# Altium PCB Gear_Trak-v1.0.PcbDoc (part 1 of 5)
Units mil, origin at the board's own origin, x right, y up, seen from the top; angles counter-clockwise.
Board outline 1383 x 2953 mil, 6 copper layers (TOP LAYER, GROUND1, SIGNAL, GROUND2, POWER, BOTTOM LAYER), stack 60.865 mil thick; 166 components, 125 nets, 751 pads, 771 vias.
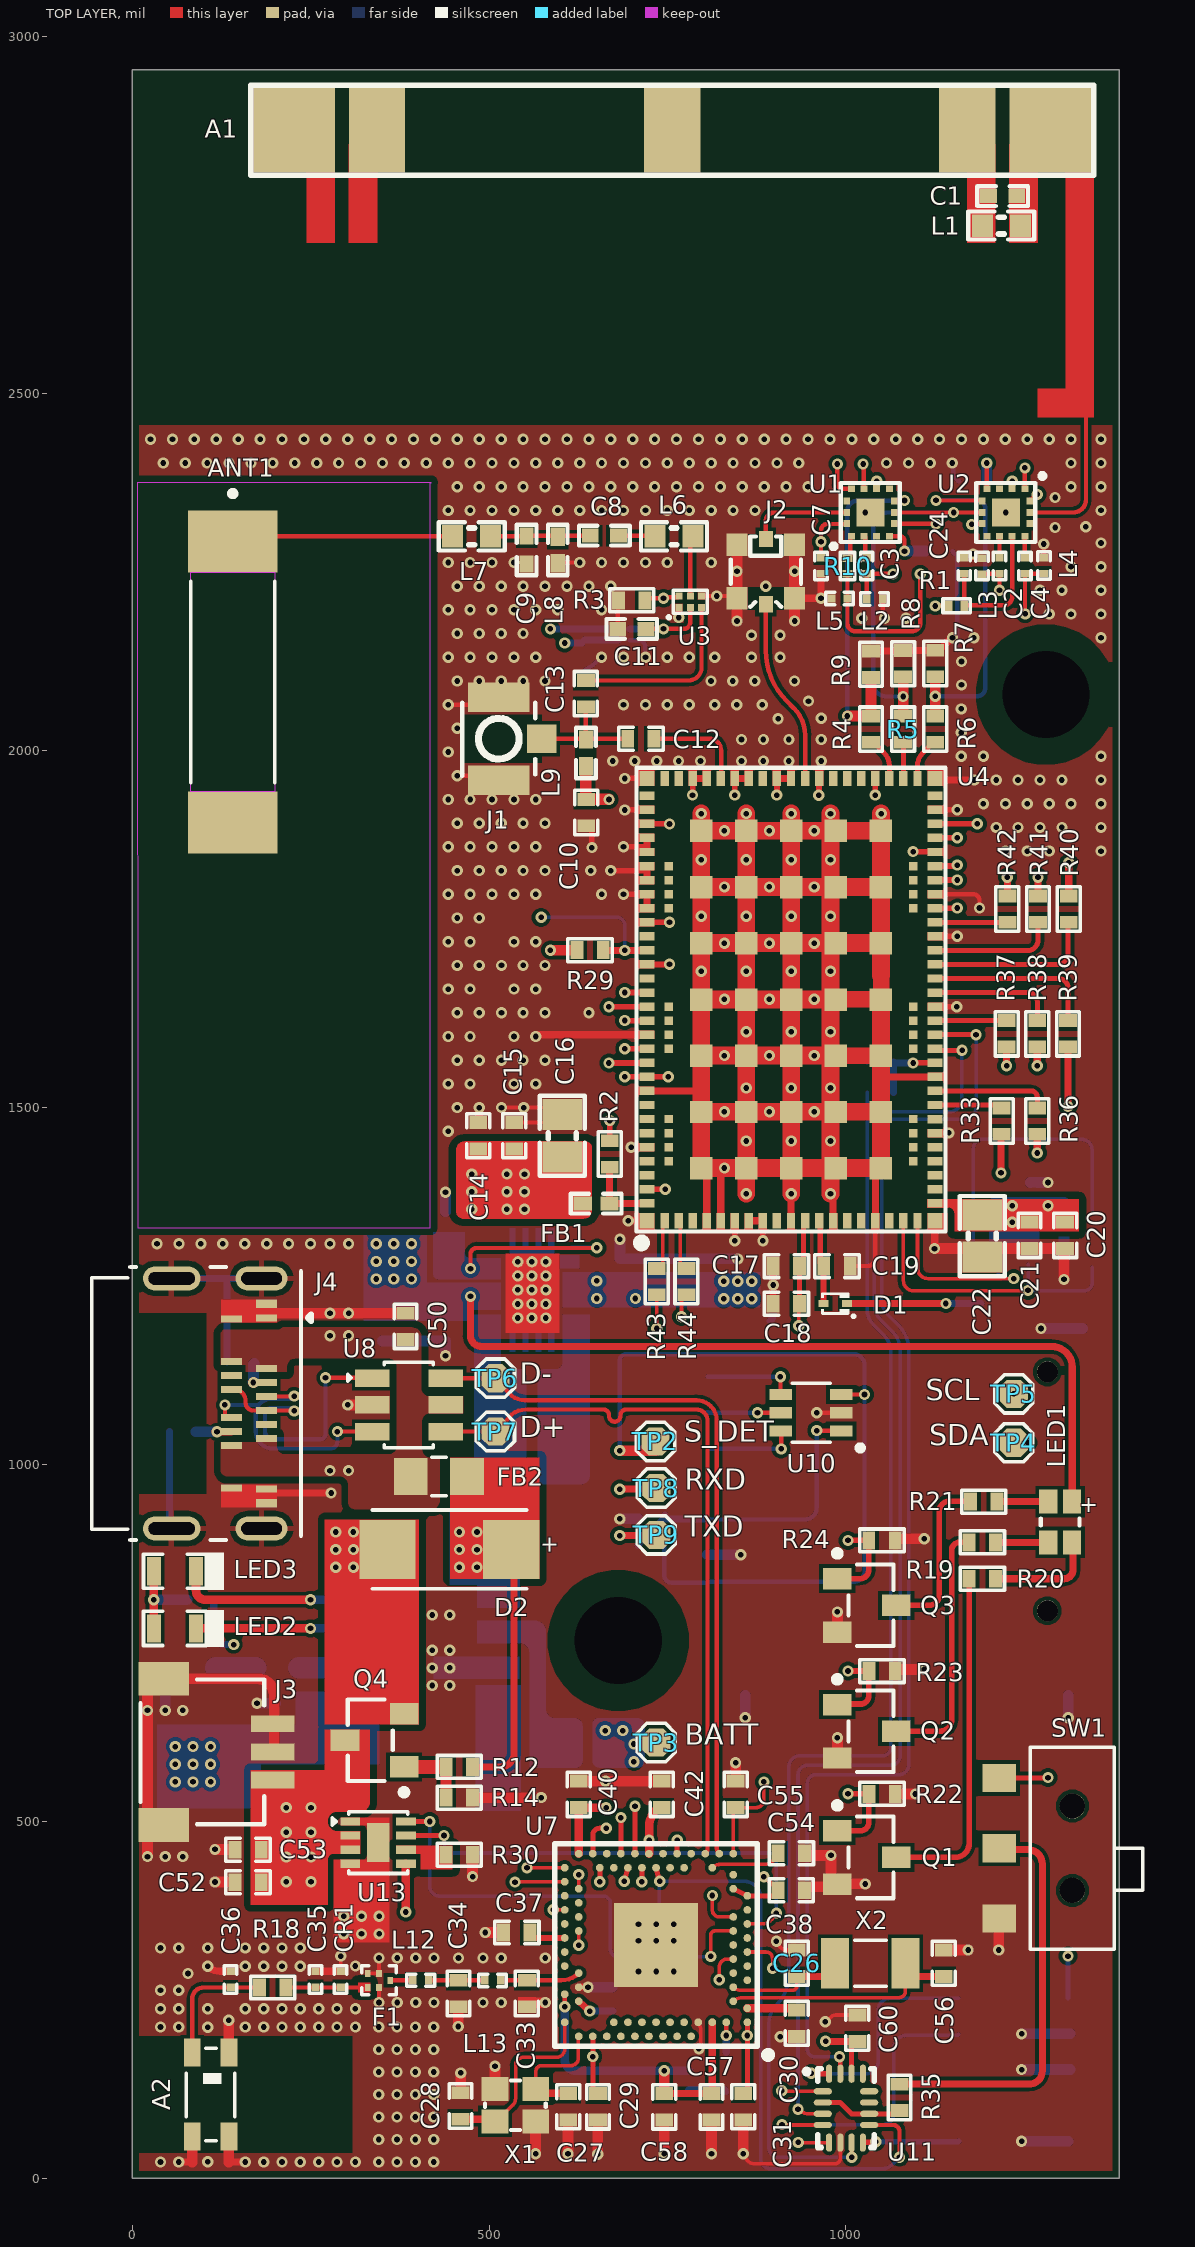
[diagram p0: TOP LAYER view]
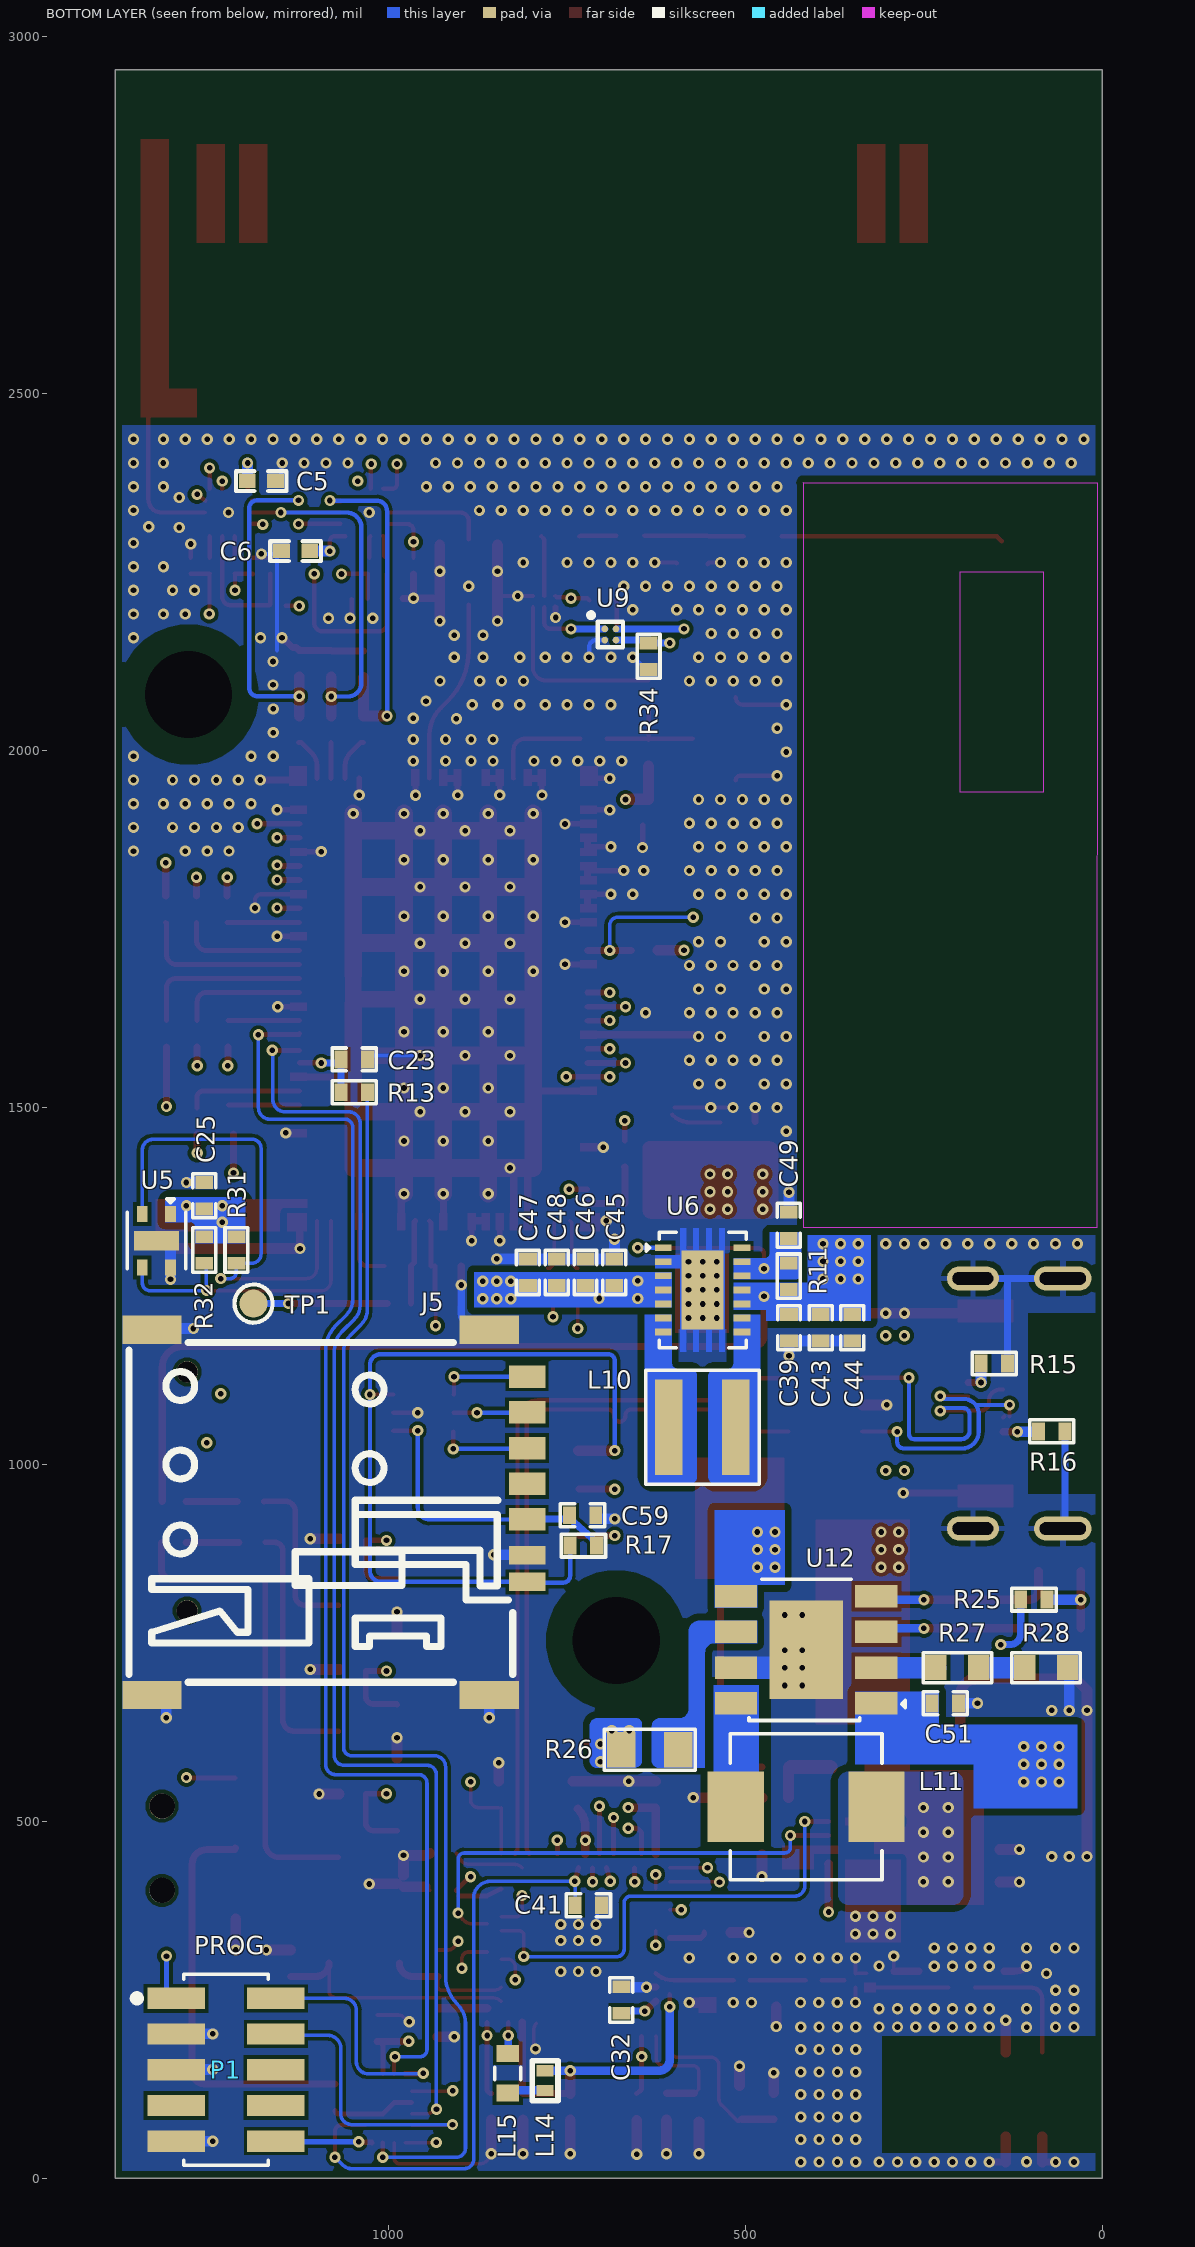
[diagram p1: BOTTOM LAYER view, seen from below]
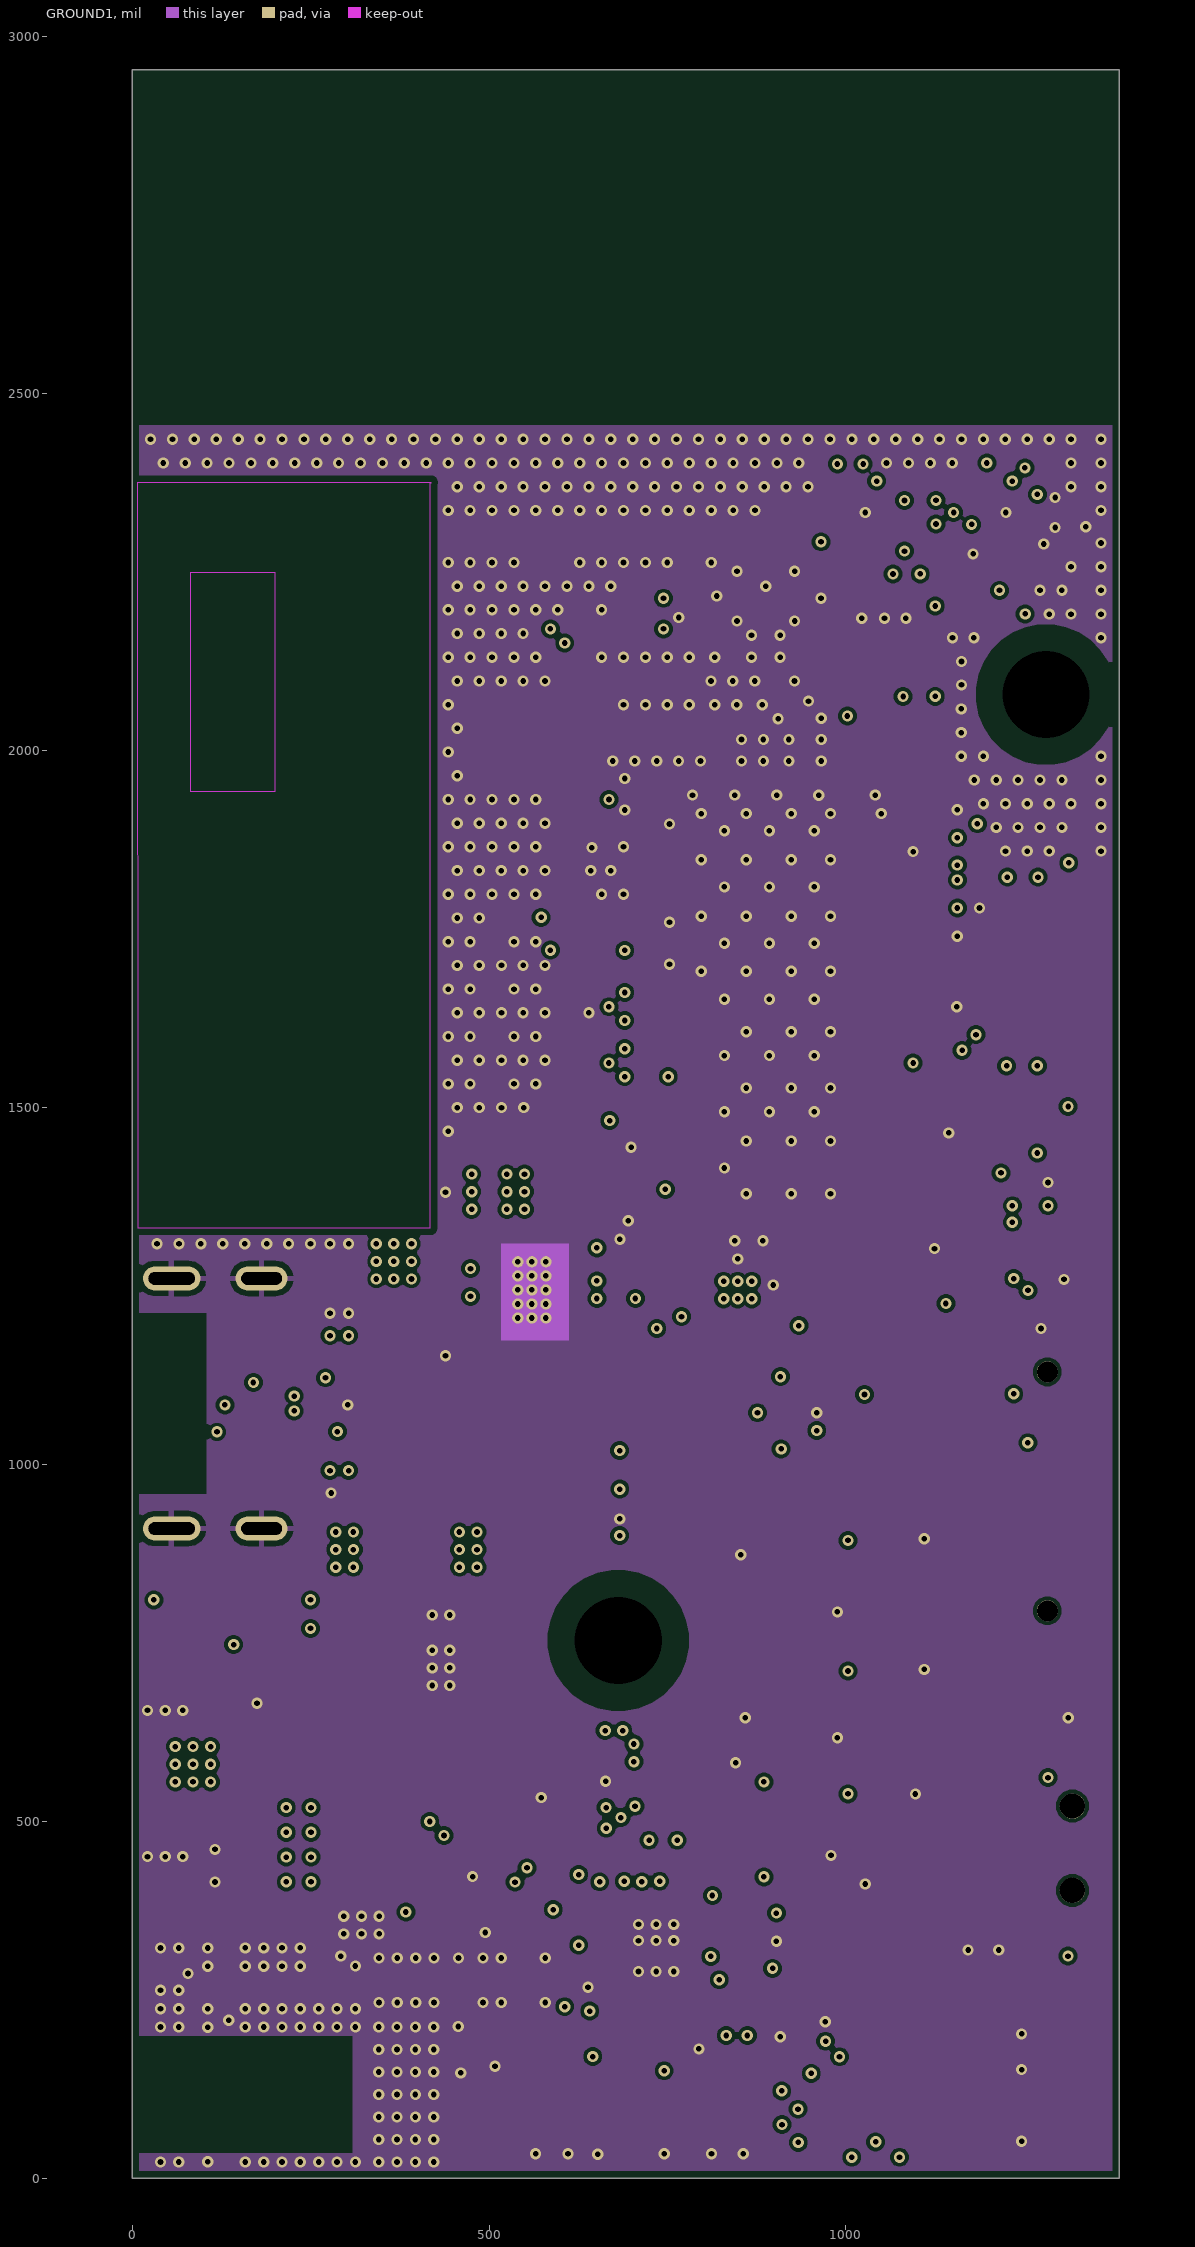
[diagram p2: GROUND1]
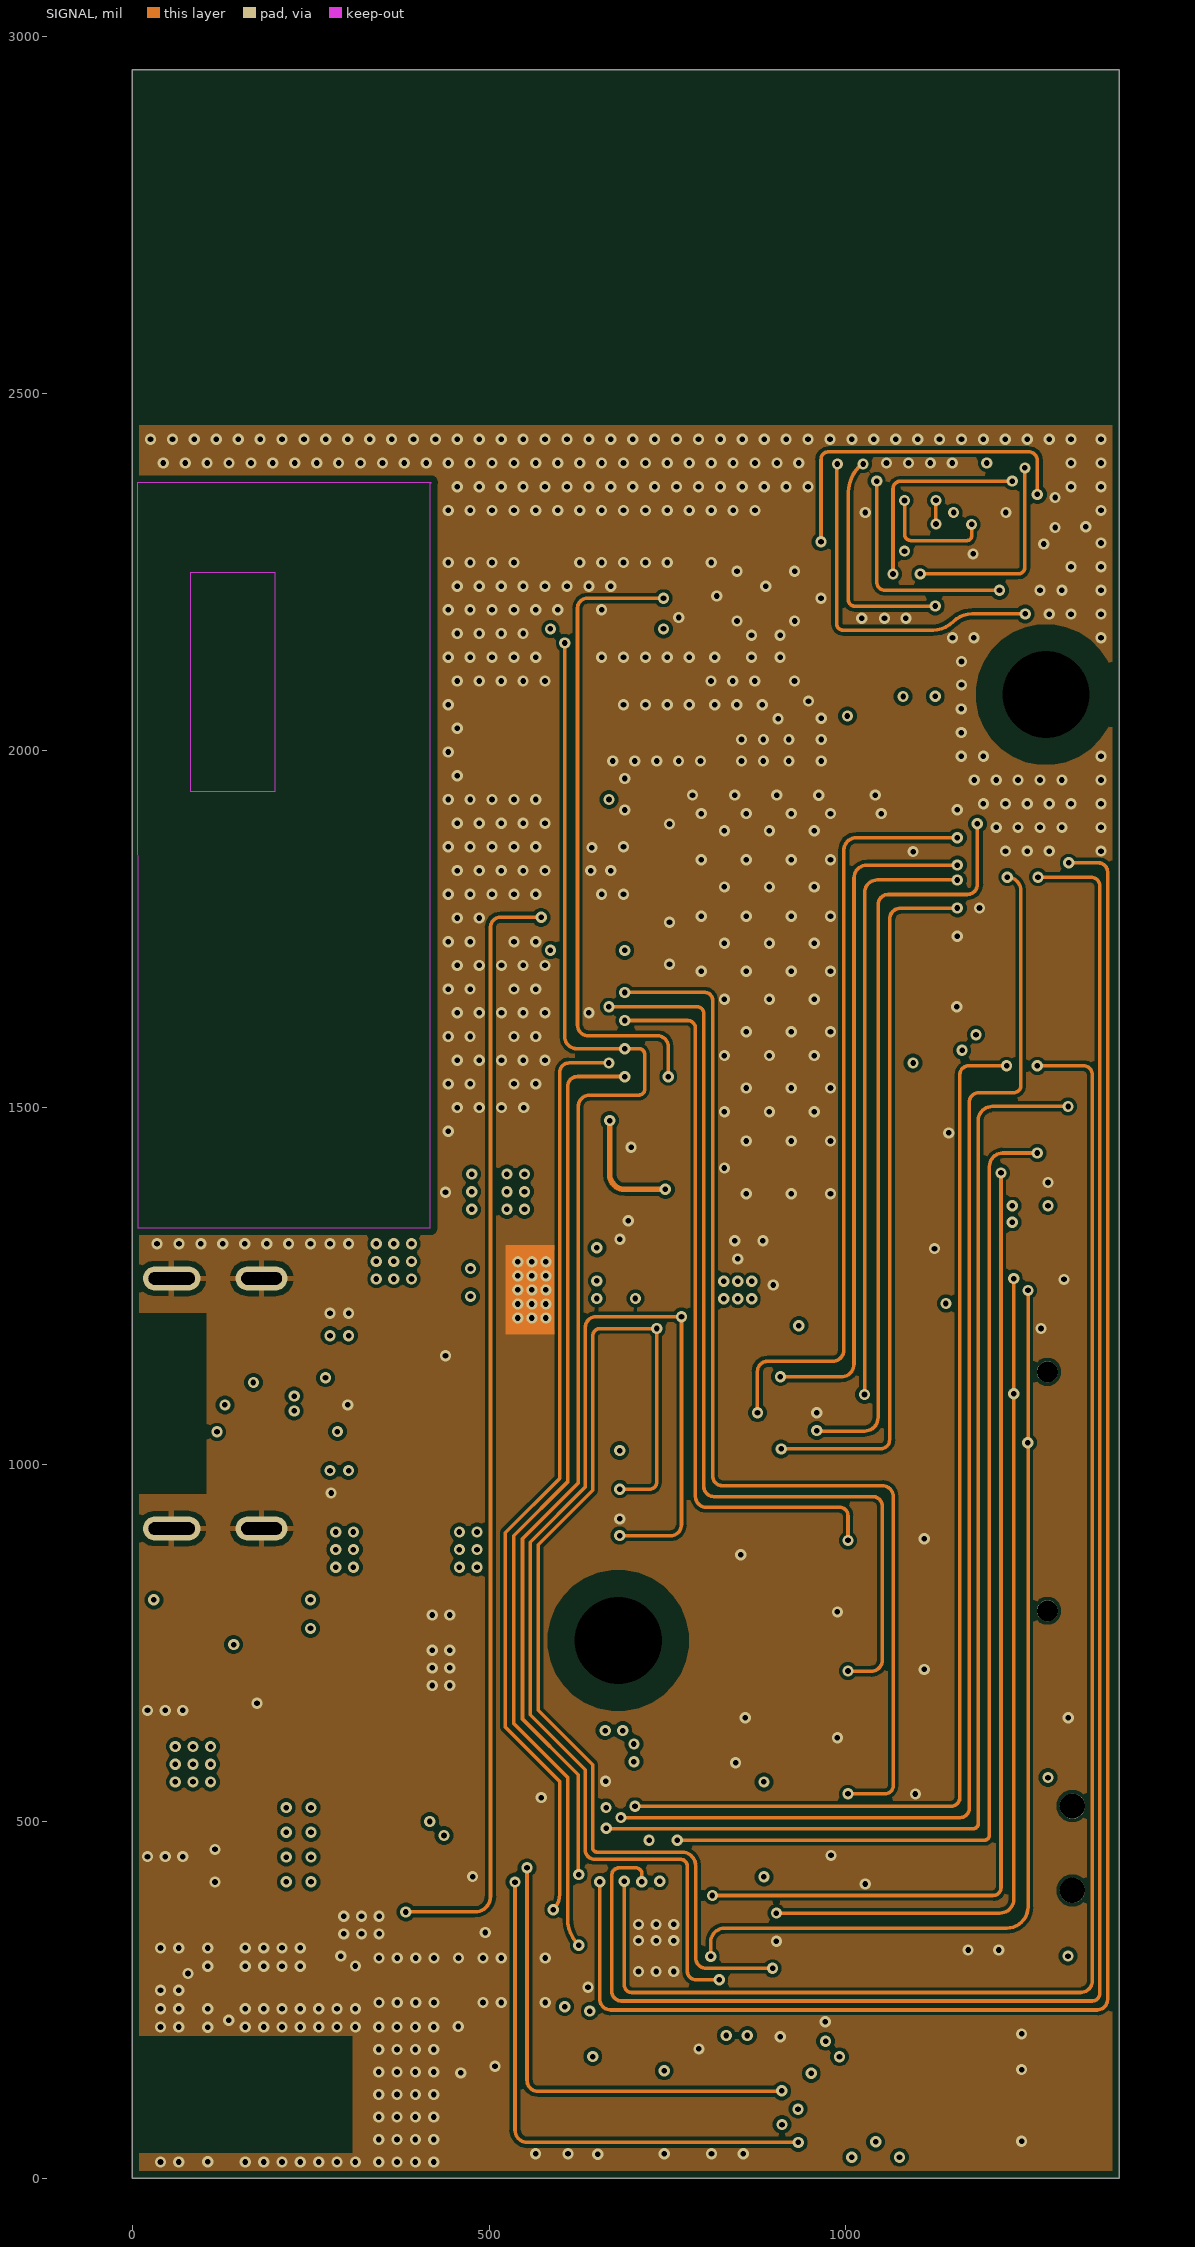
[diagram p3: SIGNAL]
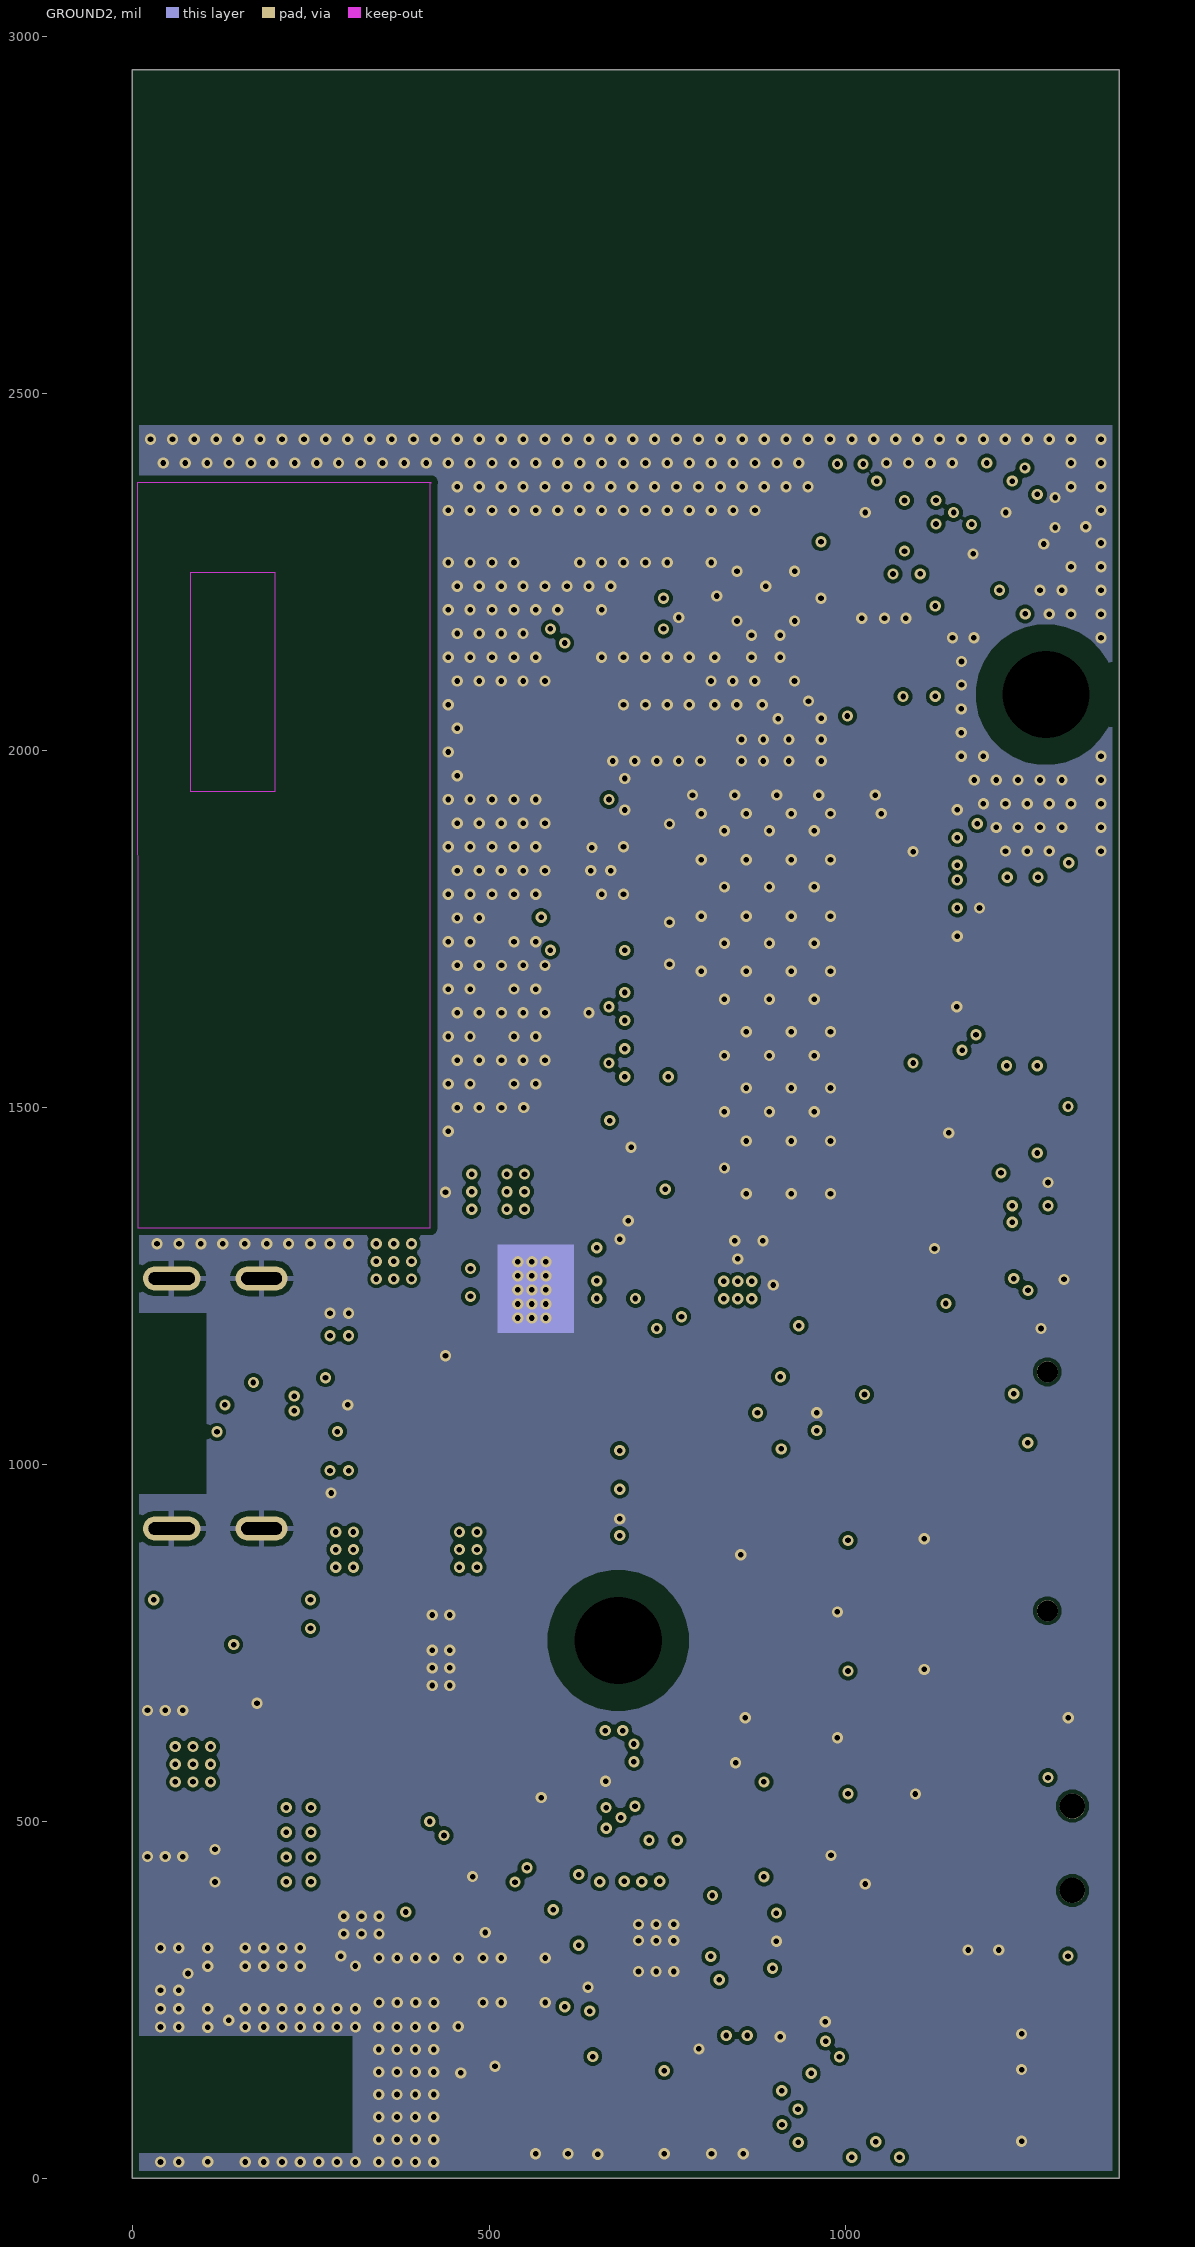
[diagram p4: GROUND2]
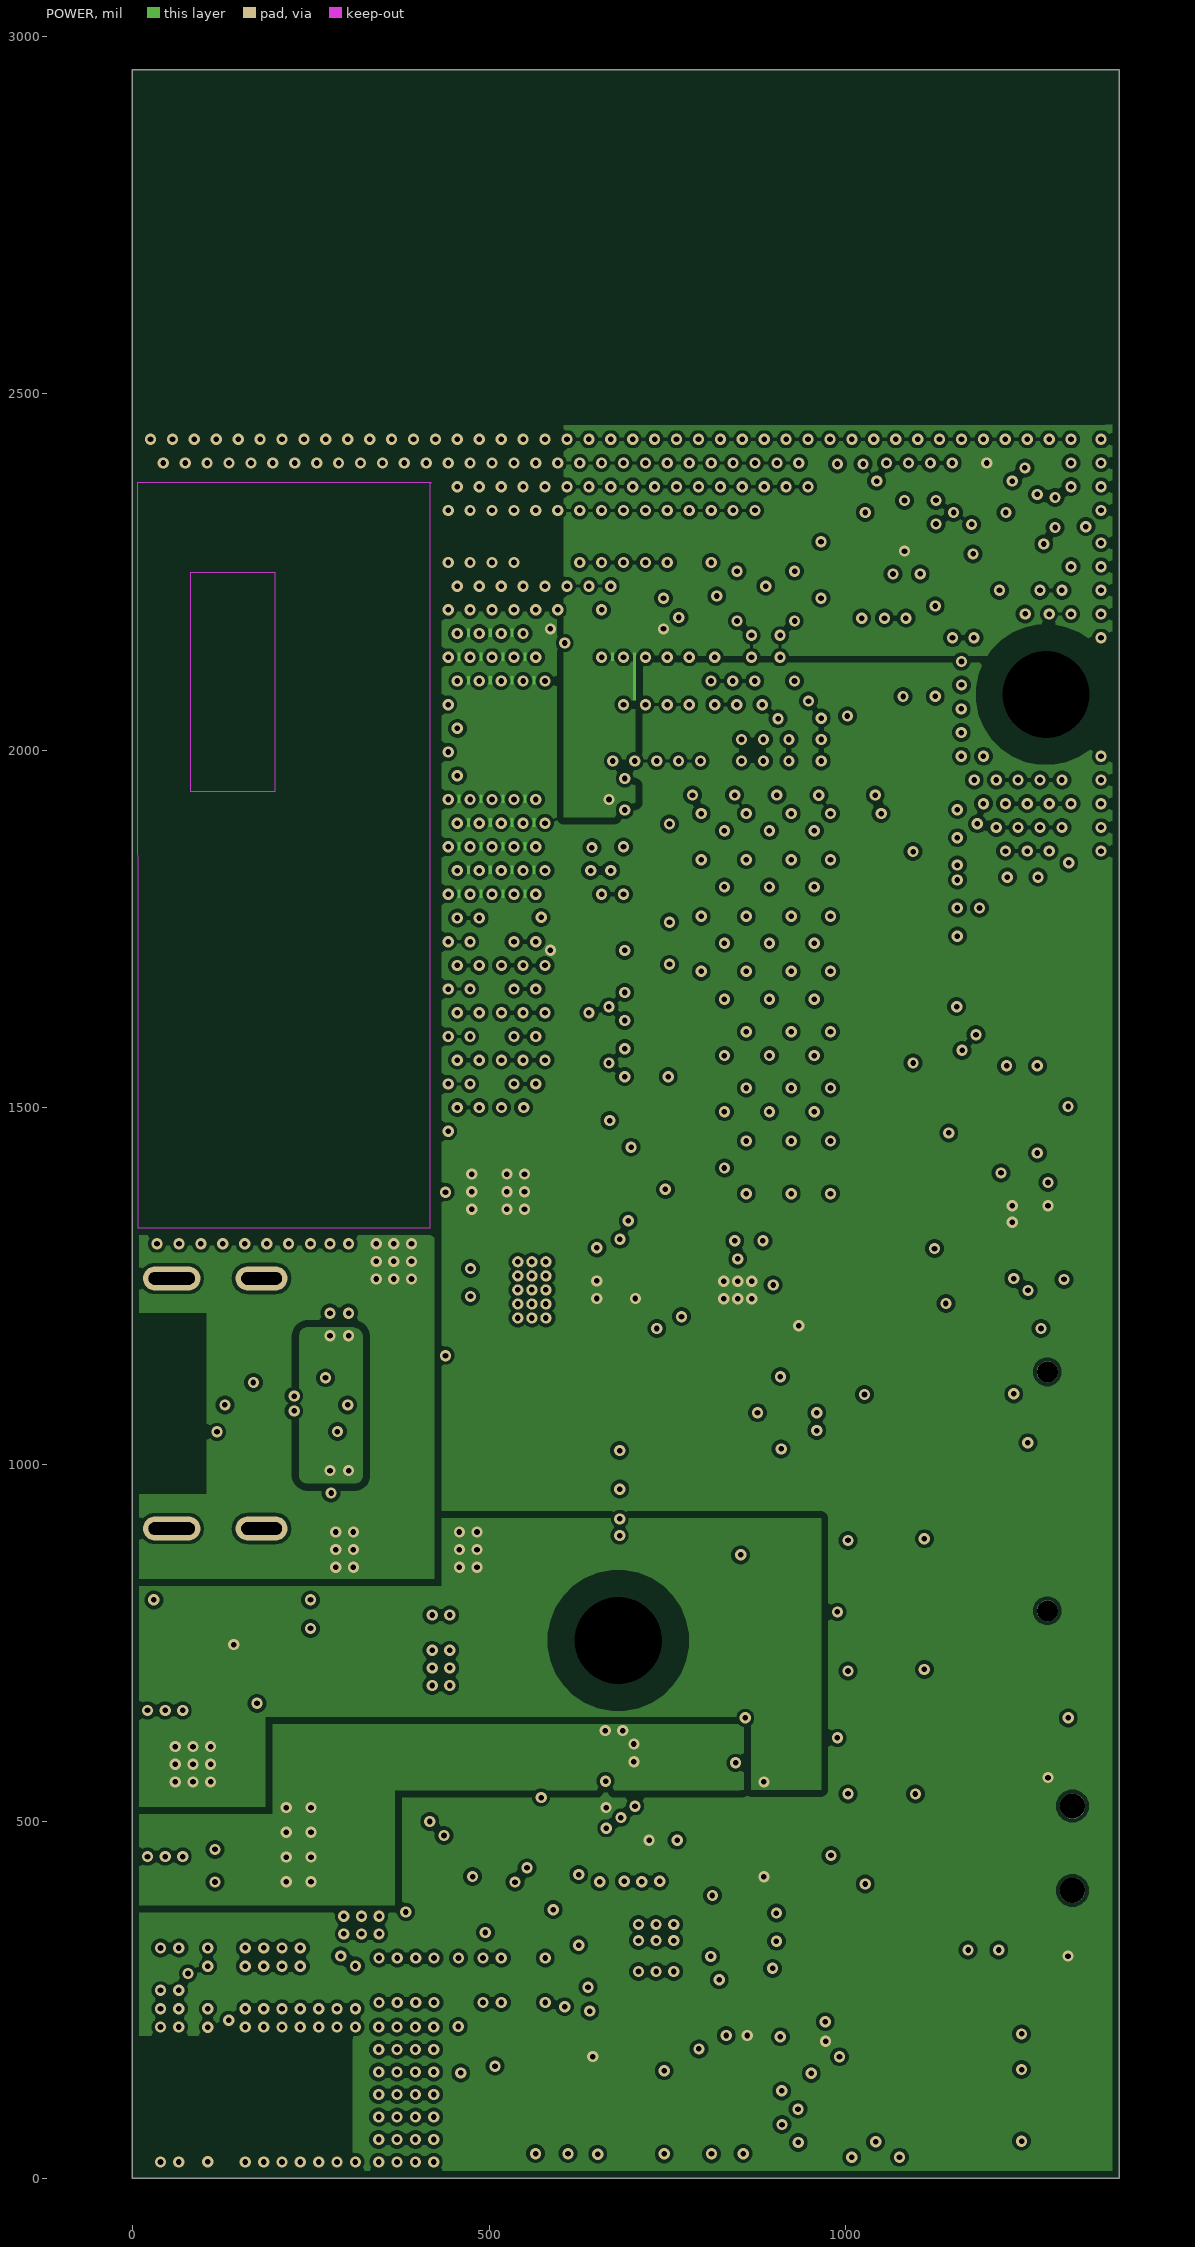
[diagram p5: POWER]
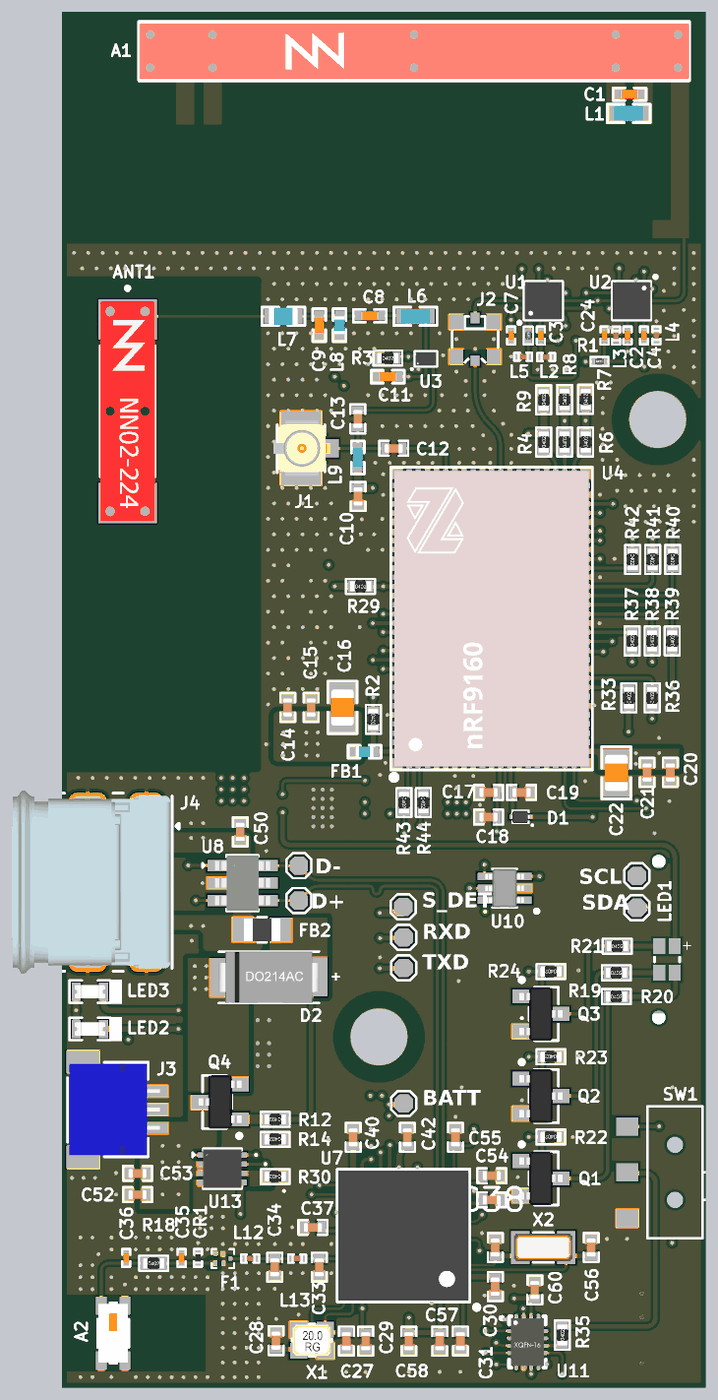
[diagram p8: 3D render of the assembled board from above, using the file's embedded part models]
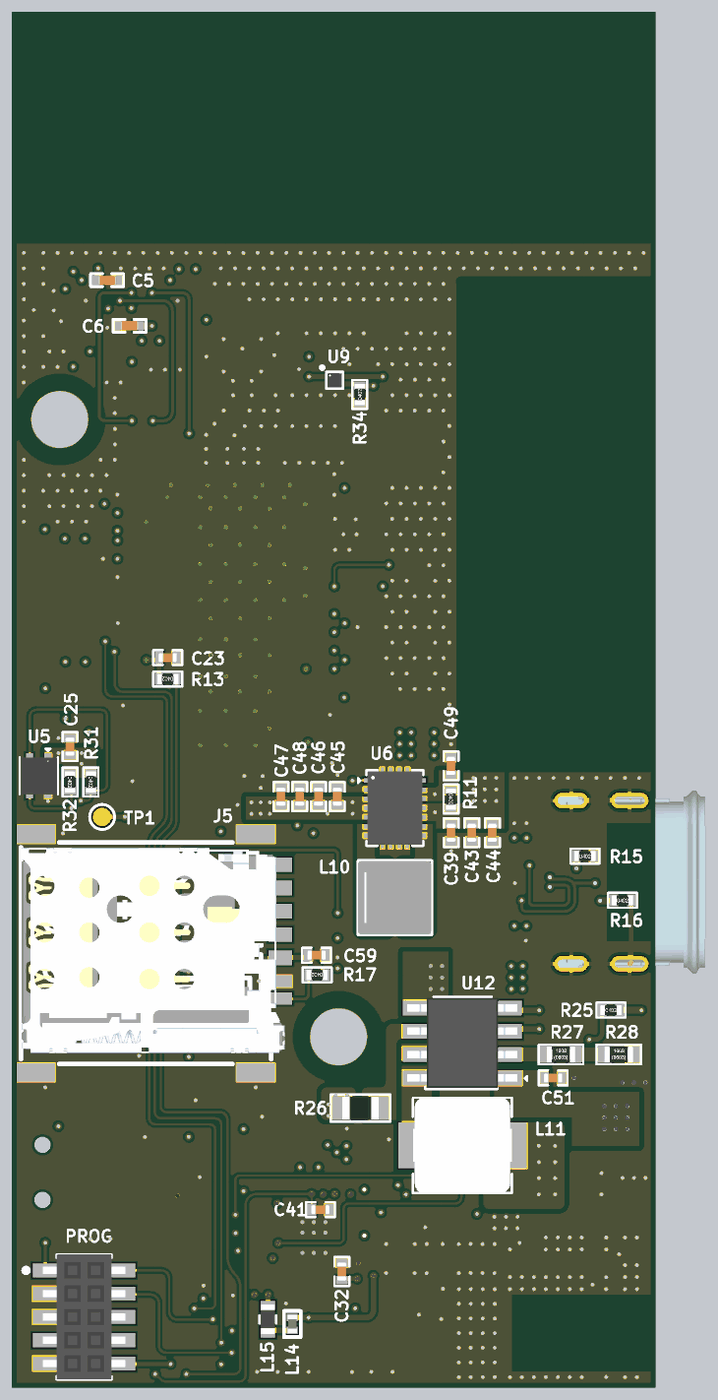
[diagram p9: 3D render of the assembled board from below, using the file's embedded part models]

## Layer stack, top to bottom
Top Solder: solder mask 1.187, Solder Resist, Dk 3.5
TOP LAYER: signal copper 1.378
Dielectric 1: prepreg 3.913, PP-015, Dk 4.1
GROUND1: signal copper 0.598
CORE 1: core 21.654, Core-025, Dk 4.6
SIGNAL: signal copper 0.598
Dielectric 2: prepreg 4.583, PP-016, Dk 4.16
GROUND2: signal copper 0.598
CORE 2: core 21.654, Core-025, Dk 4.6
POWER: signal copper 0.598
Dielectric 3: prepreg 3.913, PP-015, Dk 4.1
BOTTOM LAYER: signal copper 1.378
Bottom Solder: solder mask 1.187, Solder Resist, Dk 3.5

## Board outline
0,0 0,1121 0,2953 1383,2953 1383,0

## Design rules (kind name [scope] priority, off if disabled: settings)
BoardOutlineClearance [All] p1: gap=0 ignorepadtopadclearanceinfootprint=FALSE except(10: Fill-OutlineEdge Poly-OutlineEdge)
Clearance [All] p1: gap=5 ignorepadtopadclearanceinfootprint=FALSE except(10: Fill-Poly Poly-Poly Poly-Region)
ComponentClearance [All] p1 off: gap=10 collisioncheckmode=3 verticalgap=10 showdistances=FALSE
DiffPairsRouting [InDifferentialPairClass('USB')] p1: maxlimit=7 minlimit=5 mostfreqgap=5 toplayer_mingap=7 toplayer_prefgap=7 toplayer_minwidth=5.9 toplayer_maxwidth=5.9 toplayer_prefwidth=5.9 midlayer1_mingap=7 midlayer1_prefgap=7 midlayer1_minwidth=4.91 midlayer1_maxwidth=4.91 midlayer1_prefwidth=4.91 midlayer2_maxgap=5 midlayer2_minwidth=4.17 midlayer2_maxwidth=4.17 midlayer2_prefwidth=4.17 midlayer3_maxgap=5 midlayer3_minwidth=4.57 midlayer3_maxwidth=4.57 midlayer3_prefwidth=4.57 midlayer4_maxgap=5 midlayer4_minwidth=4.64 midlayer4_maxwidth=4.64 midlayer4_prefwidth=4.64 bottomlayer_mingap=7 bottomlayer_prefgap=7 bottomlayer_minwidth=5.9 bottomlayer_maxwidth=5.9 bottomlayer_prefwidth=5.9 impedanceprofiledriven=TRUE impedanceprofileid={BFF03AB4-9B6E-46EF-8445-FC28C5802467} impedanceprofilevalue=90.000000 maxuncoupledlength=500
FabricationTestPointUsage TestPointUsage [All] p1: valid=0 allowmultiple=FALSE
FabricationTestpoint Testpoint [All] p1: side=3 testpointundercomponent=TRUE minsize=40 maxsize=100 preferedsize=60 minholesize=0 maxholesize=40 preferedholesize=32 testpointgrid=1 allowsidetop=TRUE allowsidebottom=TRUE usegrid=TRUE gridtolerance=0.01
Height [All] p1 off: minheight=0 maxheight=1000 prefheight=500
HoleSize [All] p1: absolutevalues=TRUE maxlimit=196.85 minlimit=3.94 maxpercent=80.000 minpercent=20.000
MinimumAnnularRing [All] p1 off: minimumring=6
NetAntennae NetAntennae_ANT [InNet('ANT')] p1: netantennaetolerance=1574.8
NetAntennae [All] p2: netantennaetolerance=0
PlaneClearance [All] p1: clearance=15.75
PolygonConnect [All] p1: thpad.connectstyle=Relief thpad.reliefconductorwidth=7.87 thpad.reliefentries=4 thpad.polygonreliefangle="90 Angle" thpad.airgapwidth=7.87 smdpad.connectstyle=Direct smdpad.reliefconductorwidth=11.81 smdpad.reliefentries=4 smdpad.polygonreliefangle="90 Angle" smdpad.airgapwidth=7.87 via.connectstyle=Direct via.reliefconductorwidth=10 via.reliefentries=4 via.polygonreliefangle="90 Angle" via.airgapwidth=10
RoutingVias [All] p1: holewidth=7.87 width=15.75 viastyle="Through Hole" minholewidth=7.87 minwidth=15.75 maxholewidth=11.81 maxwidth=23.62
ShortCircuit ShortCircuit_AGND/GND [InNet('AGND') vs InNet('GND')] p1: allowed=TRUE
ShortCircuit [All] p2: allowed=FALSE
SilkToSolderMaskClearance SilkscreenOverComponentPads [IsPad] p1: minsilkscreentomaskgap=10 clearancetoexposedcopper=TRUE
SolderMaskExpansion SolderMaskExpansion_1 [IsVia] p1: expansion=4 istentingtop=FALSE
SolderMaskExpansion [All] p2: expansion=3 istentingtop=FALSE
SupplyNets "Schematic Supply Nets_7" [InNet('VDD_RF_FE')] p1: voltage=0.000
SupplyNets "Schematic Supply Nets_6" [InNet('VBAT')] p2: voltage=0.000
SupplyNets "Schematic Supply Nets_5" [InNet('VBUS-TYPEC')] p3: voltage=0.000
SupplyNets "Schematic Supply Nets_4" [InNet('GND')] p4: voltage=0.000
SupplyNets "Schematic Supply Nets_3" [InNet('VBUS')] p5: voltage=0.000
SupplyNets "Schematic Supply Nets_2" [InNet('SIM_1V8')] p6: voltage=0.000
SupplyNets "Schematic Supply Nets_1" [InNet('VSYS')] p7: voltage=0.000
SupplyNets "Schematic Supply Nets" [InNet('+3V3')] p8: voltage=0.000
UnpouredPolygon [All] p1 off:
Width [All] p1: maxlimit=400 minlimit=4.92 preferedwidth=6 toplayer_minwidth=5 midlayer1_minwidth=5 midlayer2_minwidth=5 midlayer3_maxwidth=100 midlayer3_prefwidth=5.91 midlayer4_maxwidth=100 midlayer4_prefwidth=5.91 bottomlayer_minwidth=5 minimp=50.000000 maximp=50.000000 favimp=50.000000
19 further rules are at their usual default settings.

## Classes and differential pairs
differential pair class USB: TYPEC TYPEC_D
component class "1.Power Source": C39 C43 C44 C45 C46 C47 C48 C49 C50 D2 FB2 J3 J4 L10 Q4 R11 R12 R14 R15 R16 R34 TP6 TP7 U6 U8 U9
component class "2.Battery Management": C51 C52 C53 L11 LED2 LED3 R25 R26 R27 R28 R29 R30 R31 R32 TP3 U12 U13
component class 6.Connectors: C59 C60 J5 P1 R17 R35 SW1 TP2 U10 U11
component class 4.Microcontroller-NRF9160: A1 ANT1 C1 C2 C3 C4 C5 C6 C7 C8 C9 C10 C11 C12 C13 C14 C15 C16 C17 C18 C19 C20 C21 C22 C23 C24 D1 FB1 J1 J2 L1 L2 L3 L4 L5 L6 L7 L8 L9 R1 R2 R3 R4 R5 R6 R7 R8 R9 R10 R13 R33 R36 R37 R38 R39 R40 R41 R42 R43 R44 TP1 TP8 TP9 U1 U2 U3 U4
component class 5.RGB_TEMP-HUMIDITY: C25 LED1 Q1 Q2 Q3 R19 R20 R21 R22 R23 R24 TP4 TP5 U5
differential pair TYPEC: +TYPEC_P -TYPEC_N
differential pair TYPEC_D: +TYPEC_D_P -TYPEC_D_N

## Components (designator, comment, footprint, x,y, rotation, side; value= is the part's Value field where it differs from the comment)
A1 "NN03-310" FR01-S4-210_DF 756.57,2868.62 r0 top value=FR01-S4-210
A2 "2450AT18D0100E" 2450AT18D0100E 109.94,117.11 r270 top
ANT1 "NN02-224" ANT-NN02-224 141,2292.54 r270 top
C1 "0.5pF" CAPC1005X04L 1219.43,2776.15 r180 top
C2 "2.5pF" CAPC0603X03L_C 1215.05,2258.26 r270 top
C3 "5.5pF" CAPC0603X03L_C 1029,2258.26 r90 top
C4 "9.2pF" CAPC0603X03L_C 1250.48,2258.32 r270 top
C5 "2.2nF" CAPC1005X04L 1178.17,2377 r180 bottom
C6 "2.2nF" CAPC1005X04L 1130,2279 r0 bottom
C7 "1.5pF" CAPC0603X03L_C 965,2258.26 r270 top
C8 "1nF" CAPC1005X04L 661.49,2300.54 r180 top
C9 "3.7pF" CAPC1005X04L 552.7,2280.54 r270 top
C10 "39pF" Cap-0402 636.1,1912.74 r90 top
C11 "33nF" CAPC1005X04L 700,2170 r0 top
C12 "39pF" Cap-0402 712.76,2016.17 r0 top
C13 "39pF" Cap-0402 635.64,2079.34 r270 top
C14 "15pF" Cap-0402 485,1460 r270 top
C15 "100nF" cap-0402 535.38,1460 r90 top
C16 "47uF" CAPC2012X11L 602.57,1460 r90 top
C17 "100nF" cap-0402 916.49,1277.45 r180 top
C18 "4.7uF" Cap-0402 916.48,1224.63 r180 top
C19 "4.7uF" Cap-0402 987.37,1277.45 r0 top
C20 "15pF" Cap-0402 1307,1320.5 r90 top
C21 "100nF" cap-0402 1257,1320.5 r270 top
C22 "47uF" CAPC2012X11L 1191,1319.47 r270 top
C23 "100nF" cap-0402 1048,1567 r180 bottom
C24 "3.1pF" CAPC0603X03L_C 1165.69,2258.26 r270 top
C25 "100nF" cap-0402 1258,1376 r90 bottom
C26 "12pF" Cap-0402 931,301 r270 top
C27 "12pF" Cap-0402 611,100 r270 top
C28 "12pF" Cap-0402 460,101 r90 top
C29 "100nF" cap-0402 652.64,99.78 r270 top
C30 "100nF" cap-0402 931,217 r270 top
C31 "1uF" Cap-0402 856,100 r90 top
C32 "100nF" cap-0402 673.83,249.44 r90 bottom
C33 "1pF" Cap-0402 553,258.58 r90 top
C34 "1.2pF" Cap-0402 457.23,258.58 r90 top
C35 "DNP" CAPC0603X03L_C 256.88,278.44 r270 top
C36 "DNP" CAPC0603X03L_C 138,278.44 r270 top
C37 "820pF" Cap-0402 539,344 r180 top
C38 "4.7uF" Cap-0402 923.43,403.1 r0 top
C39 "22uF" Cap-0402 439,1191.09 r90 bottom
C40 "100nF" cap-0402 625.63,537.5 r90 top
C41 "100nF" cap-0402 720,382.21 r180 bottom
C42 "100nF" cap-0402 742,537.5 r90 top
C43 "22uF" Cap-0402 394.68,1191.09 r90 bottom
C44 "22uF" Cap-0402 350.36,1191.09 r90 bottom
C45 "22uF" Cap-0402 683.72,1268.7 r270 bottom
C46 "22uF" Cap-0402 724.04,1268.7 r270 bottom
C47 "22uF" Cap-0402 804.68,1268.69 r270 bottom
C48 "22uF" Cap-0402 764.36,1268.7 r270 bottom
C49 "100nF" cap-0402 439.36,1334.7 r270 bottom
C50 "100nF" cap-0402 383.05,1193 r90 top
C51 "22uF" Cap-0402 220,665 r0 bottom
C52 "22uF" Cap-0402 162.5,414.4 r0 top
C53 "1uF" Cap-0402 162.5,460 r0 top
C54 "4.7uF" Cap-0402 923.5,455 r0 top
C55 "4.7uF" Cap-0402 845.4,537.5 r90 top
C56 "12pF" Cap-0402 1137,301 r270 top
C57 "1uF" Cap-0402 811.56,99.78 r90 top
C58 "47nF" Cap-0402 745.37,99.78 r90 top
C59 "100nF" cap-0402 728.18,928.38 r0 bottom
C60 "100nF" cap-0402 1015.91,210 r90 top
CR1 "EZA-EG1N50AC" RESC0603X03L_C 292.14,278.44 r270 top
D1 "NSR0620P2T5G" SODFL100X40-2N 985,1225 r180 top
D2 "SS54" DO-214AC(SMA) 437.54,876.81 r0 top
F1 "SAFFB2G45MA0F0A" SAFFB2G45MA0F0A 345.84,277.06 r180 top
FB1 "120R/0.7A" INDC1005X04L 650,1365 r0 top
FB2 "BLM21PG221SN1D" Ind-0805 429.88,982.79 r0 top
J1 "U.FL-R-SMT-1(10)" "COAXIAL RF U.FL-R-SMT-1" 513.64,2016.17 r90 top
J2 "MM8130-2600RA2" COAXIAL-SWF 887.66,2250.14 r180 top
J3 "BATT" CONN_SMD_3P_1mm_SM03B-SRSS-TB 197,597 r270 top
J4 "203615-0003" 2036150003 122,1085 r270 top
J5 "SMN-303" XUNPU_SMN-303 1072.63,907.99 r270 bottom locked
L1 "15nH" INDC1608X06L_WW 1217.57,2735 r180 top
L2 "5.1nH" INDC0603X03L_C 1040.22,2212 r180 top
L3 "DNP" INDC0603X03L_C 1190.37,2258.03 r270 top
L4 "6.2nH" INDC0603X03L_C 1277.2,2258.58 r270 top
L5 "4.7nH" INDC0603X03L_C 990.93,2212.6 r0 top
L6 "8.2nH" INDC1608X06L_WW 759.2,2299.54 r180 top
L7 "11nH" INDC1608X06L 475.65,2299.54 r180 top
L8 "2.4nH" INDC1005X04L_2 596.27,2280.55 r90 top
L9 "68nH" INDC1005X04L_WW 635.64,1996.24 r90 top
L10 "1uH" XFL4020-102MEC 560.5,1051.7 r0 bottom
L11 "2.2uH" YSPI0520-2R2M_ 415,520 r180 bottom
L12 "2.2nH" INDC0603X03L_C 404.35,277.09 r180 top value=3.9nH
L13 "4.7nH" INDC0603X03L_C 505.12,277 r180 top
L14 "15nH" IND-0402 780.5,136.57 r90 bottom
L15 "10uH" "IND-0603 (1608 Metric)" 833,147 r270 bottom value=1.05R
LED1 "RGB" LED_RGB_0606 1300,919 r180 top
LED2 "Emerald" LED-0603 60,770 r0 top
LED3 "RED" LED-0603 60,850 r0 top
P1 "20021321-00010C4LF" 20021321-00010C4LF 1227.59,151.78 r180 bottom
Q1 "AO3400" SOT-23a 987.81,486.63 r270 top
Q2 "AO3400" SOT-23a 987.81,663.23 r270 top
Q3 "AO3400" SOT-23a 987.81,839.63 r270 top
Q4 "SI2343CDS" SOT-23a 380.96,575.9 r90 top
R1 "0R" Res-0201 1154.87,2202.5 r0 top
R2 "10K" Res-0402 669,1434.5 r270 top
R3 "100K" Res-0402 700,2210 r0 top
R4 "1K" Res-0402 1035.01,2029.63 r90 top
R5 "1K" Res-0402 1080.01,2029.63 r90 top
R6 "1K" Res-0402 1125.01,2029.63 r90 top
R7 "1M" Res-0402 1125.01,2121.5 r90 top value=1MR
R8 "1M" Res-0402 1080.01,2121.07 r90 top value=1MR
R9 "1M" Res-0402 1035.01,2120.37 r90 top value=1MR
R10 "0R" Res-0201 1002.15,2258.01 r270 top
R11 "DNP" Res-0402 439.36,1263.4 r270 bottom
R12 "47K" Res-0402 458.23,575.9 r180 top
R13 "1K" Res-0402 1048,1521 r0 bottom
R14 "100K" Res-0402 458.23,532.9 r180 top
R15 "5.1K" Res-0402 151.5,1141 r180 bottom
R16 "5.1K" Res-0402 71,1046 r180 bottom
R17 "100K" Res-0402 727,886 r0 bottom
R18 "0R" Res-0402 197,267 r0 top
R19 "200R" Res-0402 1191,890.46 r0 top
R20 "330R" Res-0402 1191,839.53 r0 top
R21 "200R" Res-0402 1193,947.54 r0 top
R22 "100K" Res-0402 1050.49,538.23 r180 top
R23 "100K" Res-0402 1050.49,710.23 r180 top
R24 "100K" Res-0402 1050.48,893.23 r180 top
R25 "1K" Res-0402 95.9,810.37 r180 bottom
R26 "1K" RES-0805 634,600 r0 bottom value=1kR
R27 "953R" Res-0603 203.22,715.15 r0 bottom
R28 "15R" Res-0603 78.9,715 r0 bottom
R29 "10K" Res-0402 641.5,1720 r0 top
R30 "10K" Res-0402 458.23,453 r180 top
R31 "4.7K" Res-0402 1213,1300 r270 bottom
R32 "4.7K" Res-0402 1258,1300 r270 bottom
R33 "DNP" Res-0402 1218,1480.64 r90 top
R34 "100K" Res-0402 635.64,2131.75 r90 bottom
R35 "100K" Res-0402 1075,113 r90 top
R36 "DNP" Res-0402 1268,1480.64 r90 top
R37 "DNP" Res-0402 1225,1602.75 r90 top
R38 "DNP" Res-0402 1268,1602.75 r90 top
R39 "DNP" Res-0402 1311,1602.75 r90 top
R40 "DNP" Res-0402 1312,1777.55 r270 top
R41 "DNP" Res-0402 1269,1777.55 r270 top
R42 "DNP" Res-0402 1226,1777.55 r270 top
R43 "0R" Res-0402 735,1255.79 r270 top
R44 "0R" Res-0402 776.52,1255.79 r270 top
SW1 "K3-1280S-F1" K3-1280S-F1 1265.82,462.06 r90 top
TP1 "Ø1.0mm,SMD" TP_SMD_Ø1.0mm 1189,1225 r180 bottom
TP2 "TEST POINT 0.5mm Dia" "Test-point - 0.5mm" 733.18,1031.93 r90 top
TP3 "TEST POINT 0.5mm Dia" "Test-point - 0.5mm" 734.18,610 r90 top
TP4 "TEST POINT 0.5mm Dia" "Test-point - 0.5mm" 1235,1030.01 r90 top
TP5 "TEST POINT 0.5mm Dia" "Test-point - 0.5mm" 1235,1098.52 r90 top
TP6 "TEST POINT 0.5mm Dia" "Test-point - 0.5mm" 509,1120.4 r90 top
TP7 "TEST POINT 0.5mm Dia" "Test-point - 0.5mm" 509,1045.6 r90 top
TP8 "TEST POINT 0.5mm Dia" "Test-point - 0.5mm" 734.18,966.43 r90 top
TP9 "TEST POINT 0.5mm Dia" "Test-point - 0.5mm" 734.18,901 r90 top
U1 "SKY13418-485LF" UFQFN40P200X200X65_HS-15N 1034.09,2333.07 r90 top
U2 "SKY13418-485LF" UFQFN40P200X200X65_HS-15N 1223.91,2333.08 r270 top
U3 "BGA524N6" XFDFN40P100X55-6N 781.88,2208.17 r90 top
U4 "nRF9160-SICAB1A" LGA50P1600X1050X104-161N 923,1650.78 r90 top locked
U5 "SHTC3-TR-2.5KS" "4-WDFN Exposed Pad" 1325,1313 r270 bottom
U6 "TPS63021DSJR" "14-VSON (4x3)" 560,1244.09 r180 bottom
U7 "nRF52840" AQFN50P700X700X85_HS-74N 733.9,326.5 r180 top
U8 "USBLC6-2SC6" SOT-23-6 388,1083 r0 top
U9 "TCK106AG" BGA4C40P2X2_76X76X62 689.17,2162.13 r180 bottom
U10 "SMF05C.TCT" SOT65P210X110-6N 960,1092 r180 top
U11 "FSA2466UMX" XQFN40P180X260X50-16N 1000,98 r0 top
U12 "SLM6600" 8-SO-EP_ 415,740 r0 bottom
U13 "MAX17048G+T10" "8-TDFN-EP (2x2)" 344.66,470 r0 top
X1 "32MHz" BT-XTAL_2016 537,102 r0 top
X2 "32.768KHz" SMD3215-2P 1034,301 r180 top

## Footprints (in the part's own frame and the unit in brackets; to place one, negate y for a bottom-side part, rotate by r counter-clockwise, add the part's x,y. Pads: shape width x height; smd on the part's side, far side on the other; paste and mask are expansions set on the pad)
"4-WDFN Exposed Pad" [mm]
  rect 0.57x0.38 smd paste+0 mask+0.051: 1(-0.95,0.5) 2(-0.95,-0.5) 3(0.95,-0.5) 4(0.95,0.5)
  rect 0.7x1.6 smd paste+0 mask+0.051: 5(0,0)
  silkscreen extent -1.48,-1.04 0.99,1.04, body extent -1,-1 1,1, height 0.76
8-SO-EP_ [mm]
  rect 1.505x0.802 smd: 1(-2.497,1.905) 2(-2.497,0.635) 3(-2.497,-0.635) 4(-2.497,-1.905) 5(2.498,-1.905) 6(2.498,-0.635) 7(2.498,0.635) 8(2.498,1.905)
  rect 2.613x3.502 smd: 9(0,0)
  silkscreen extent -3.53,-2.51 2.03,2.51, body extent -3,-2.45 3,2.45, height 1.7
"8-TDFN-EP (2x2)" [mm]
  rect 0.7x0.3 smd: 1(-0.99,0.75) 2(-0.99,0.25) 3(-0.99,-0.25) 4(-0.99,-0.75) 5(0.99,-0.75) 6(0.99,-0.25) 7(0.99,0.25) 8(0.99,0.75)
  rect 0.8x1.38 smd: 9(0,0)
  silkscreen extent -1.63,-1.1 1.05,1.1, body extent -1.05,-1.05 1.05,1.05, height 0.81
"14-VSON (4x3)" [mm]
  rect 0.6x0.24 smd: 1(-1.4,1.5) 2(-1.4,1) 3(-1.4,0.5) 4(-1.4,0) 5(-1.4,-0.5) 6(-1.4,-1) 7(-1.4,-1.5) 8(1.4,-1.5) 9(1.4,-1) 10(1.4,-0.5) 11(1.4,0) 12(1.4,0.5) 13(1.4,1) 14(1.4,1.5)
  round 0.4 hole 0.2 mask+0.076: 15(-0.5,-1) 15(-0.5,-0.5) 15(-0.5,0) 15(-0.5,0.5) 15(-0.5,1) 15(0,-1) 15(0,-0.5) 15(0,0) 15(0,0.5) 15(0,1) 15(0.5,-1) 15(0.5,-0.5) 15(0.5,0) 15(0.5,0.5) 15(0.5,1)
  rect 1.5x2.8 smd: 15(0,0)
  TOP LAYER region: 0.79,-2.2 0.59,-2.2 0.59,-1.425 0.33,-1.425 0.33,-2.2 0.13,-2.2 0.13,-1.425 -0.13,-1.425 -0.13,-2.2 -0.33,-2.2 -0.33,-1.425 -0.59,-1.425 -0.59,-2.2 -0.79,-2.2 -0.79,2.2 -0.59,2.2 -0.59,1.425 -0.33,1.425 -0.33,2.2 -0.13,2.2 -0.13,1.425 0.13,1.425 0.13,2.2 0.33,2.2 0.33,1.425 0.59,1.425 0.59,2.2 0.79,2.2
  silkscreen extent -2.01,-2.06 1.55,2.06, body extent -1.5,-2 1.5,2, height 1
2450AT18D0100E [mm]
  rect 1x0.6 smd paste+0 mask+0.051: 1(-1.5,-0.65) 2(-1.5,0.65) 2(1.5,0.65) 2(1.5,-0.65)
  silkscreen extent -1.65,-0.86 1.65,0.86, body extent -1.6,-0.81 1.6,0.81, height 1.22
20021321-00010C4LF [mm]
  rect 2.05x0.76 smd: 1(-1.775,2.54) 2(1.775,2.54) 3(-1.775,1.27) 4(1.775,1.27) 5(-1.775,0) 6(1.775,0) 7(-1.775,-1.27) 8(1.775,-1.27) 9(-1.775,-2.54) 10(1.775,-2.54)
  silkscreen extent -3.3,-3.4 1.5,3.4, body extent -2.25,-3.4 2.25,3.4, height 4.65
2036150003 [mm]
  rect 0.25x0.75 smd mask+0.064: A1(-3.05,1.69) A4(-1.25,1.69) A5(-0.75,1.69) A6(-0.25,1.69) A7(0.25,1.69) A8(0.75,1.69) A9(1.25,1.69) A12(3.05,1.69) B1(3,0.44) B4(1.5,0.44) B5(1,0.44) B6(0.5,0.44) B7(-0.5,0.44) B8(-1,0.44) B9(-1.5,0.44) B12(-3,0.44)
  rect 0.3x0.75 smd mask+0.064: GND1(-3.55,1.69) GND2(3.55,1.69)
  oval 0.85x1.85 hole 0.45 slot 1.45 at 90 deg mask+0.064: SH1(-4.45,1.51) SH2(4.45,1.51)
  oval 0.85x2.05 hole 0.45 slot 1.65 at 90 deg mask+0.064: SH3(-4.45,-1.69) SH4(4.45,-1.69)
  silkscreen extent -4.85,-3.16 4.85,3.28, body extent -5,-5.84 4.99,2.81, height 3.81
ANT-NN02-224 [mm]
  rect 2.2x3.2 smd: 1(0,0) 2(10,0)
  Keep-Out Layer region: 8.9,-1.5 1.1,-1.5 1.1,1.5 8.9,1.5
  Keep-Out Layer region: 8.9,-1.5 1.1,-1.5 1.1,1.5 8.9,1.5
  silkscreen extent -1.8,-1.5 8.59,1.5, body extent -1,-1.5 11,1.5, height 2.41
AQFN50P700X700X85_HS-74N [mm]
  rect 3x3 smd mask+0.05: 74(0,0)
  round 0.275 smd paste+0.012 mask+0.05: A8(-1.25,3.25) A10(-0.75,3.25) A12(-0.25,3.25) A14(0.25,3.25) A16(0.75,3.25) A18(1.25,3.25) A20(1.75,3.25) A22(2.25,3.25) A23(2.75,3.25) AA24(3.25,-2.25) AB2(-2.75,-2.5) AC5(-2,-2.75) AC9(-1,-2.75) AC11(-0.5,-2.75) AC13(0,-2.75) AC15(0.5,-2.75) AC17(1,-2.75) AC19(1.5,-2.75) AC21(2,-2.75) AC24(3.25,-2.75) AD2(-2.75,-3.25) AD4(-2.25,-3.25) AD6(-1.75,-3.25) AD8(-1.25,-3.25) AD10(-0.75,-3.25) AD12(-0.25,-3.25) AD14(0.25,-3.25) AD16(0.75,-3.25) AD18(1.25,-3.25) AD20(1.75,-3.25) AD22(2.25,-3.25) AD23(2.75,-3.25) B1(-3.25,2.75) B3(-2.5,2.75) B5(-2,2.75) B7(-1.5,2.75) B9(-1,2.75) B11(-0.5,2.75) B13(0,2.75) B15(0.5,2.75) B17(1,2.75) B19(1.5,2.75) B24(3.25,2.75) C1(-3.25,2.25) D2(-2.75,2) D23(2.75,2) E24(3.25,1.75) F2(-2.75,1.5) F23(2.75,1.5) G1(-3.25,1.25) H2(-2.75,1) H23(2.75,1) J1(-3.25,0.75) J24(3.25,0.75) K2(-2.75,0.5) L1(-3.25,0.25) L24(3.25,0.25) M2(-2.75,0) N1(-3.25,-0.25) N24(3.25,-0.25) P2(-2.75,-0.5) P23(2.75,-0.5) R1(-3.25,-0.75) R24(3.25,-0.75) T2(-2.75,-1) T23(2.75,-1) U1(-3.25,-1.25) U24(3.25,-1.25) V23(2.75,-1.5) W1(-3.25,-1.75) W24(3.25,-1.75) Y2(-2.75,-2) Y23(2.75,-2)
  silkscreen extent -4.11,-3.6 3.6,4.04, body extent -3.55,-3.55 3.55,3.55, height 0.85
BGA4C40P2X2_76X76X62 [mm]
  round 0.235 smd mask+0.05: A1(-0.2,0.2) A2(0.2,0.2) B1(-0.2,-0.2) B2(0.2,-0.2)
  silkscreen extent -0.74,-0.45 0.45,0.74, body extent -0.39,-0.39 0.4,0.4, height 0.55
BT-XTAL_2016 [mm]
  rect 0.95x0.85 smd: 1(-0.725,-0.575) 2(0.725,-0.575) 3(0.725,0.575) 4(-0.725,0.575)
  silkscreen extent -1.08,-0.88 1.08,0.88, body extent -1.05,-0.85 1.05,0.85, height 0.56
Cap-0402 [mil]
  rect 18x25 smd mask+2.36: 1(-18.5,0) 2(18.5,0)
  silkscreen extent -31,-16 31,16, body extent -20,-10 20,10, height 19
cap-0402 [mil]
  rect 18x25 smd mask+2.36: 1(-18.5,0) 2(18.5,0)
  silkscreen extent -31,-16 31,16, body extent -20,-10 20,10, height 19
CAPC0603X03L_C [mm]
  rect 0.27x0.3 smd mask+0.025: 1(-0.285,0) 2(0.285,0)
  silkscreen extent -0.49,-0.22 0.49,0.22, body extent -0.3,-0.15 0.3,0.15, height 0.3
CAPC1005X04L [mm]
  rect 0.6x0.5 smd mask+0.025: 1(-0.5,0) 2(0.5,0)
  silkscreen extent -0.9,-0.35 0.9,0.35, body extent -0.51,-0.25 0.51,0.25, height 0.5
CAPC2012X11L [mm]
  rect 1.1x1.4 smd mask+0.025: 1(-0.75,0) 2(0.75,0)
  silkscreen extent -1.43,-0.8 1.42,0.8, body extent -1,-0.62 1,0.63, height 0.77
"COAXIAL RF U.FL-R-SMT-1" [mm]
  rect 1x1.05 smd: 1(0,-1.525)
  rect 1.05x2.2 smd: 2(-1.475,0) 2(1.475,0)
  TOP LAYER pour cut-out: 0.85,1.3 -0.85,1.3 -0.85,-1.525 0.85,-1.525
  silkscreen extent -1.32,-1.3 1.28,1.3, body extent -1.5,-1.6 1.5,1.5, height 1.25
COAXIAL-SWF [mm]
  rect 0.5x0.58 smd: 1(0,1.16) 3(0,-1.16)
  rect 0.75x0.8 smd: 2(-1.025,0.95) 2(-1.025,-0.95) 2(1.025,0.95) 2(1.025,-0.95)
  TOP LAYER pour cut-out: 0.65,-0.55 -0.65,-0.55 -0.65,-1.35 0.65,-1.35
  TOP LAYER pour cut-out: -0.65,0.55 0.65,0.55 0.65,1.35 -0.65,1.35
  silkscreen extent -1.25,-1.25 1.25,1.25, body extent -1.26,-1.3 1.26,1.3, height 1.4
CONN_SMD_3P_1mm_SM03B-SRSS-TB [mm]
  rect 1.2x1.8 smd: 0(-2.6,-3.875) 0(2.6,-3.875)
  rect 0.6x1.55 smd: 1(-1,0) 2(0,0) 3(1,0)
  silkscreen extent -2.57,-4.7 2.58,-0.3, body extent -2.5,-4.61 2.5,0.34, height 2.95
DO-214AC(SMA) [mm]
  rect 2x2.1 smd: 1(2.378,0.102) 2(-2.022,0.102)
  silkscreen extent -2.57,-1.3 2.92,1.5, body extent -2.57,-1.3 2.92,1.5, height 2.29
FR01-S4-210_DF [mm]
  rect 2x3 smd: 0(0,0) 2(10.5,0) 4(-10.5,0)
  rect 3x3 smd: 1(13.5,0) 3(-13.5,0)
  TOP LAYER region: 15,-10.211 15,-0.312 14,-0.312 14,-10.211
  TOP LAYER region: 15,-9.2 15,-10.211 13,-10.211 13,-9.2
  TOP LAYER region: -10.5,-0.5 -11.5,-0.5 -11.5,-4 -10.5,-4
  TOP LAYER region: -12,-0.5 -13,-0.5 -13,-4 -12,-4
  TOP LAYER region: 11.5,-0.5 10.5,-0.5 10.5,-4 11.5,-4
  TOP LAYER region: 13,-0.5 12,-0.5 12,-4 13,-4
  Multi-Layer pour cut-out: -19.025,2 15.4,2 15.4,-10.5 -19.025,-10.5
  silkscreen extent -15,-1.6 15,1.6, body extent -15,-1.5 15,1.5, height 1
IND-0402 [mm]
  rect 0.4x0.6 smd: 1(-0.35,0) 2(0.35,0)
  silkscreen extent -0.71,-0.46 0.71,0.46, body extent -0.5,-0.25 0.5,0.25, height 0.25
"IND-0603 (1608 Metric)" [mm] "0.063\" L x 0.032\" W (1.60mm x 0.80mm)"
  rect 0.6x0.8 smd: 1(-0.7,0) 2(0.7,0)
  silkscreen extent -0.2,-0.46 0.23,0.46, body extent -0.8,-0.4 0.8,0.4, height 0.78
Ind-0805 [mm] "Inductor 0805"
  rect 1.2x1.32 smd: 1(-1,0) 2(1,0)
  silkscreen extent -0.25,-0.69 0.25,0.69, body extent -1,-0.62 1,0.63, height 0.47
INDC0603X03L_C [mm]
  rect 0.27x0.3 smd: 1(-0.285,0) 2(0.285,0)
  silkscreen extent -0.49,-0.22 0.49,0.22, body extent -0.31,-0.16 0.31,0.16, height 0.26
INDC1005X04L [mm]
  rect 0.65x0.5 smd: 1(-0.475,0) 2(0.475,0)
  silkscreen extent -0.9,-0.35 0.9,0.35, body extent -0.5,-0.3 0.5,0.3, height 0.5
INDC1005X04L_2 [mm]
  rect 0.65x0.5 smd: 1(-0.475,0) 2(0.475,0)
  silkscreen extent -0.9,-0.35 0.9,0.35, body extent -0.5,-0.3 0.5,0.3, height 0.5
INDC1005X04L_WW [mm]
  rect 0.65x0.5 smd: 1(-0.475,0) 2(0.475,0)
  silkscreen extent -0.9,-0.35 0.9,0.35, body extent -0.5,-0.3 0.5,0.3, height 0.51
INDC1608X06L [mm]
  rect 0.75x0.8 smd: 1(-0.675,0) 2(0.675,0)
  silkscreen extent -1.17,-0.5 1.17,0.5, body extent -0.8,-0.48 0.8,0.47, height 0.8
INDC1608X06L_WW [mm]
  rect 0.75x0.8 smd: 1(-0.675,0) 2(0.675,0)
  silkscreen extent -1.17,-0.5 1.17,0.5, body extent -0.8,-0.45 0.8,0.45, height 0.81
K3-1280S-F1 [mm]
  rect 1x1.2 smd paste+0 mask+0.05: 1(-2.5,1.3) 2(0,1.3) 3(2.5,1.3)
  round 0.9 hole 0.9 unplated paste-2539.97 mask+0.076: ""(-1.5,-1.3) ""(1.5,-1.3)
  silkscreen extent -3.6,-3.8 3.6,0.2
LED-0603 [mm]
  rect 0.5x1 smd: 1(-0.75,0) 2(0.75,0)
  silkscreen extent -1.12,-0.66 1.75,0.66, body extent -0.82,-0.37 0.82,0.36, height 0.68
LED_RGB_0606 [mm]
  rect 0.65x0.85 smd paste+0 mask+0.01: 1(-0.425,0.725) 2(0.425,0.725) 3(0.425,-0.725) 4(-0.425,-0.725)
  silkscreen extent -0.69,-0.13 0.69,0.13, body extent -0.75,-0.8 0.75,0.8, height 0.18
LGA50P1600X1050X104-161N [mm]
  rect 0.54x0.54 smd mask+0.05: 1(-7.87,5.12) 21(-7.87,-5.12) 52(7.87,-5.12) 72(7.87,5.12)
  rect 0.54x0.3 smd mask+0.05: 2(-7.87,4.5) 3(-7.87,4) 4(-7.87,3.5) 5(-7.87,3) 6(-7.87,2.5) 7(-7.87,2) 8(-7.87,1.5) 9(-7.87,1) 10(-7.87,0.5) 11(-7.87,0) 12(-7.87,-0.5) 13(-7.87,-1) 14(-7.87,-1.5) 15(-7.87,-2) 16(-7.87,-2.5) 17(-7.87,-3) 18(-7.87,-3.5) 19(-7.87,-4) 20(-7.87,-4.5) 53(7.87,-4.5) 54(7.87,-4) 55(7.87,-3.5) 56(7.87,-3) 57(7.87,-2.5) 58(7.87,-2) 59(7.87,-1.5) 60(7.87,-1) 61(7.87,-0.5) 62(7.87,0) 63(7.87,0.5) 64(7.87,1) 65(7.87,1.5) 66(7.87,2) 67(7.87,2.5) 68(7.87,3) 69(7.87,3.5) 70(7.87,4) 71(7.87,4.5)
  rect 0.3x0.54 smd mask+0.05: 22(-7.25,-5.12) 23(-6.75,-5.12) 24(-6.25,-5.12) 25(-5.75,-5.12) 26(-5.25,-5.12) 27(-4.75,-5.12) 28(-4.25,-5.12) 29(-3.75,-5.12) 30(-3.25,-5.12) 31(-2.75,-5.12) 32(-2.25,-5.12) 33(-1.75,-5.12) 34(-1.25,-5.12) 35(-0.75,-5.12) 36(-0.25,-5.12) 37(0.25,-5.12) 38(0.75,-5.12) 39(1.25,-5.12) 40(1.75,-5.12) 41(2.25,-5.12) 42(2.75,-5.12) 43(3.25,-5.12) 44(3.75,-5.12) 45(4.25,-5.12) 46(4.75,-5.12) 47(5.25,-5.12) 48(5.75,-5.12) 49(6.25,-5.12) 50(6.75,-5.12) 51(7.25,-5.12) 73(7.25,5.12) 74(6.75,5.12) 75(6.25,5.12) 76(5.75,5.12) 77(5.25,5.12) 78(4.75,5.12) 79(4.25,5.12) 80(3.75,5.12) 81(3.25,5.12) 82(2.75,5.12) 83(2.25,5.12) 84(1.75,5.12) 85(1.25,5.12) 86(0.75,5.12) 87(0.25,5.12) 88(-0.25,5.12) 89(-0.75,5.12) 90(-1.25,5.12) 91(-1.75,5.12) 92(-2.25,5.12) 93(-2.75,5.12) 94(-3.25,5.12) 95(-3.75,5.12) 96(-4.25,5.12) 97(-4.75,5.12) 98(-5.25,5.12) 99(-5.75,5.12) 100(-6.25,5.12) 101(-6.75,5.12) 102(-7.25,5.12)
  rect 0.8x0.8 smd mask+0.05: 103(-6,-3.2) 103(-6,-1.6) 103(-6,0) 103(-6,1.6) 103(-6,3.2) 103(-4,-3.2) 103(-4,-1.6) 103(-4,0) 103(-4,1.6) 103(-4,3.2) 103(-2,3.2) 103(-2,-1.6) 103(-2,0) 103(-2,1.6) 103(-2,-3.2) 103(0,3.2) 103(0,1.6) 103(0,0) 103(0,-1.6) 103(0,-3.2) 103(2,3.2) 103(2,-1.6) 103(2,0) 103(2,1.6) 103(2,-3.2) 103(4,-3.2) 103(4,-1.6) 103(4,0) 103(4,1.6) 103(4,3.2) 103(6,-3.2) 103(6,-1.6) 103(6,0) 103(6,1.6) 103(6,3.2)
  rect 0.3x0.3 smd mask+0.05: 104(-5.75,-4.35) 105(-5.25,-4.35) 106(-4.75,-4.35) 107(-4.25,-4.35) 108(-1.75,-4.35) 109(-1.25,-4.35) 110(-0.75,-4.35) 111(-0.25,-4.35) 112(3.25,-4.35) 113(3.75,-4.35) 114(4.25,-4.35) 115(4.75,-4.35) 116(4.75,4.35) 117(4.25,4.35) 118(3.75,4.35) 119(3.25,4.35) 120(-0.25,4.35) 121(-0.75,4.35) 122(-1.25,4.35) 123(-1.75,4.35) 124(-4.25,4.35) 125(-4.75,4.35) 126(-5.25,4.35) 127(-5.75,4.35)
  TOP LAYER pour cut-out: -8.15,5.4 8.15,5.4 8.15,-5.4 -8.15,-5.4
  silkscreen extent -8.81,-5.5 8.25,5.5, body extent -8.05,-5.3 8.05,5.3, height 1.2
Res-0201 [mm]
  rect 0.27x0.37 smd mask+0.055: 1(-0.275,0) 2(0.275,0)
  silkscreen extent -0.48,-0.25 0.48,0.25, body extent -0.3,-0.15 0.3,0.15, height 0.29
Res-0402 [mil]
  rect 18x25 smd mask+2.17: 1(-18.5,0) 2(18.5,0)
  silkscreen extent -32,-17 32,16, body extent -23,-11 23,11, height 16
Res-0603 [mil]
  rect 30x35 smd: 1(-30,0) 2(30,0)
  silkscreen extent -48,-21 48,21, body extent -31,-17 31,17, height 18
RES-0805 [mil] "SMD 0805"
  rect 40x50 smd: 1(-40,0) 2(40,0)
  silkscreen extent -64,-29 64,29, body extent -39,-25 39,24, height 24
RESC0603X03L_C [mm]
  rect 0.27x0.3 smd: 1(-0.285,0) 2(0.285,0)
  silkscreen extent -0.49,-0.22 0.49,0.22, body extent -0.3,-0.15 0.3,0.15, height 0.23
SAFFB2G45MA0F0A [mm]
  rect 0.2x0.25 smd mask+0.04: 1(-0.4,0) 2(0,-0.25) 3(0.4,-0.25) 4(0.4,0.25) 5(0,0.25)
  silkscreen extent -0.61,-0.51 0.61,0.51, body extent -0.55,-0.45 0.55,0.45, height 0.5
SMD3215-2P [mm]
  rect 1x1.8 smd: 1(-1.25,0) 2(1.25,0)
  silkscreen extent -0.56,-0.81 0.56,0.81, body extent -1.6,-0.75 1.6,0.75, height 0.8
SODFL100X40-2N [mm]
  rect 0.36x0.25 smd: 1(-0.42,0) 2(0.42,0)
  silkscreen extent -0.7,-0.35 0.5,0.5, body extent -0.5,-0.33 0.5,0.33, height 0.4
SOT65P210X110-6N [mm]
  rect 0.8x0.4 smd: 1(-0.846,1.158) 2(-0.846,0.508) 3(-0.846,-0.142) 4(1.304,-0.142) 5(1.304,0.508) 6(1.304,1.158)
  silkscreen extent -1.62,-0.54 0.9,1.86, body extent -0.82,-0.54 1.28,1.56, height 1.1
SOT-23-6 [mm]
  rect 1.22x0.62 smd: 1(-1.31,0.95) 2(-1.31,0) 3(-1.31,-0.95) 4(1.31,-0.95) 5(1.31,0) 6(1.31,0.95)
  silkscreen extent -2.18,-1.52 0.86,1.52, body extent -1.5,-1.5 1.5,1.5, height 1.47
SOT-23a [mil]
  rect 30x40 smd: 1(0,0) 2(74.8,0) 3(37.4,82.68)
  silkscreen extent -39,-4 94,79, body extent -20,-5 95,87, height 39
"Test-point - 0.5mm" [mm]
  oct 1x1 smd: 1(0,0)
  silkscreen extent -0.68,-0.68 0.68,0.68
TP_SMD_Ø1.0mm [mm]
  round 1 smd paste-5: 1(0,0)
  silkscreen extent -0.68,-0.68 0.68,0.68
UFQFN40P200X200X65_HS-15N [mm]
  rect 0.23x0.25 smd paste-1 mask+0.06: 1(-0.845,0.675) 2(-0.845,0.225) 3(-0.845,-0.225) 4(-0.845,-0.675) 8(0.845,-0.675) 9(0.845,-0.225) 10(0.845,0.225) 11(0.845,0.675)
  rect 0.25x0.23 smd paste-1 mask+0.06: 5(-0.4,-0.845) 6(0,-0.845) 7(0.4,-0.845) 12(0.4,0.845) 13(0,0.845) 14(-0.4,0.845)
  rect 1x1 smd paste-1 mask+0.06: 15(0,0)
  oval 0.23x0.25 on Top Paste: ""(-0.845,0.225) ""(-0.845,-0.675) ""(-0.845,-0.225) ""(-0.845,0.675) ""(0.845,-0.675) ""(0.845,-0.225) ""(0.845,0.225) ""(0.845,0.675)
  oval 0.25x0.23 on Top Paste: ""(-0.4,0.845) ""(-0.4,-0.845) ""(0,0.845) ""(0,-0.845) ""(0.4,0.845) ""(0.4,-0.845)
  rrect50% 0.85x0.85 on Top Paste: ""(0,0)
  silkscreen extent -1.28,-1.05 1.05,1.38, body extent -1.02,-1.02 1.03,1.03, height 0.65
XFDFN40P100X55-6N [mm]
  rect 0.25x0.25 smd mask+0.05: 1(-0.2,0.4) 2(-0.2,0) 3(-0.2,-0.4) 4(0.2,-0.4) 5(0.2,0) 6(0.2,0.4)
  silkscreen extent -0.61,-0.61 0.41,0.81, body extent -0.38,-0.58 0.38,0.58, height 0.4
XFL4020-102MEC [mm]
  rect 0.98x3.4 smd: 1(-1.185,0) 2(1.185,0)
  silkscreen extent -2.03,-2.03 2.01,2.03, body extent -2,-2 2,2, height 2.1
XQFN40P180X260X50-16N [mm]
  oval 0.65x0.22 smd paste-0.02 mask+0.04: 1(-0.825,0.6) 2(-0.825,0.2) 3(-0.825,-0.2) 4(-0.825,-0.6) 9(0.825,-0.6) 10(0.825,-0.2) 11(0.825,0.2) 12(0.825,0.6)
  oval 0.22x0.65 smd paste-0.02 mask+0.04: 5(-0.6,-1.225) 6(-0.2,-1.225) 7(0.2,-1.225) 8(0.6,-1.225) 13(0.6,1.225) 14(0.2,1.225) 15(-0.2,1.225) 16(-0.6,1.225)
  silkscreen extent -1.45,-1.4 1,1.4, body extent -0.91,-1.31 0.91,1.31, height 0.55
XUNPU_SMN-303 [mm]
  rect 0.8x1.3 smd paste+0 mask+0.051: C1(-0.37,6.774) C2(-2.91,6.774) C3(-5.45,6.774) C6(-1.64,6.774) C7(-4.18,6.774)
  rect 0.65x1.3 smd paste+0 mask+0.051: C5(0.9,6.774) CD(1.85,6.774)
  rect 1x2.1 smd paste+0 mask+0.051: S1(-7.12,-6.57) S2(5.88,-6.57) S3(5.88,5.43) S4(-7.12,5.43)
  round 0.75 hole 0.75 unplated paste-2539.97 mask+0.076: ""(-5.62,-5.32) ""(2.88,-5.32)
  silkscreen extent -6.66,-7.38 5.42,6.27, body extent -6.38,-7.35 4.82,7, height 1.2
YSPI0520-2R2M_ [mm]
  rect 2x2.5 smd: 1(-2.5,0) 2(2.5,0)
  silkscreen extent -2.7,-2.6 2.7,2.6, body extent -2.7,-2.6 2.7,2.6, height 1.8

## Part data
A1: library part FR01-S4-210-D, "Mobile IoT LTE Multi-Band Antenna", Digikey Part Number=2115-NN03-310CT-ND, LCSC="Non Stock", Manufacturer="Fractus Antennas", Manufacturer Part Number=FR01-S4-210, Part number IPS=80000001819, Supplier Part Number 1=N.A., Artikkelnr Noca=N.A., Component Class=Antennas, ComponentLink1Description=Datasheet, ComponentLink1URL=https://www.fractusantennas.com/wp-content/uploads/2018/01/DS_FR01-S4-210.pdf, ComponentLink2Description="Supplier link", ComponentLink2URL=https://www.fractusantennas.com/trio-mxtend-mobile-iot-antenna/, Footprint Doc=FR01-S4-210, HelpURL=https://www.fractusantennas.com/wp-content/uploads/2018/02/UM_FR01-S4-210.pdf, LatestRevisionDate=2018-07-09, Note=N.A., Pad Count=5, PartId=100700054, Part Number=FR01-S4-210-D, Published=2018-07-09, Supplier 1=N.A., Supplier 2=N.A., Supplier Part Number 2=N.A.
A2: "1.5dBi Chip Antenna 2.4GHz 2W 1206 Antennas ROHS", Clock Frequency=2.5GHz, Manufacturer=Johanson, Max Operating Temperature=125°C, Min Operating Temperature=-40°C, ComponentLink1Description=https://datasheet.ciiva.com/29647/2450at18d0100-29647392.pdf?src-supplier=Digikey, ComponentLink1URL=https://datasheet.ciiva.com/29647/2450at18d0100-29647392.pdf?src-supplier=Digikey, ComponentLink2Description=https://datasheet.ciiva.com/24046/antenna-2450at18d0100-v3-258090-24046431.pdf?src-supplier=Mouser, ComponentLink2URL=https://datasheet.ciiva.com/24046/antenna-2450at18d0100-v3-258090-24046431.pdf?src-supplier=Mouser, Item Type="RF Antennas", Manufacturer Part Number=2450AT18D0100E, Pricing="3000=0.2354, 6000=0.2331, 9000=0.2244 (USD)", RoHS=Yes, Stock=27000, Supplier="Arrow Electronics", Supplier Part Number=2450AT18D0100E
ANT1: Digikey Part Number=2115-NN02-224CT-ND, LCSC="Non Stock"
C1: library part C0402-0.5p-HQ-Murata, "Capacitor, NP0, ±0.05pF, 50V", LCSC=C76912, Package=0402, ComponentLink1Description=Datasheet, ComponentLink1URL=https://search.murata.co.jp/Ceramy/image/img/A01X/G101/ENG/GJM1555C1HR50WB01-01.pdf, ComponentLink2Description="Supplier link", ComponentLink2URL=N.A.
C2: library part C0201-5.5p-HQ-Murata, "Capacitor, NP0, ±0.05pF, 25V", LCSC=C161422, Package=0201, ComponentLink1Description=Datasheet, ComponentLink1URL=N.A., ComponentLink2Description="Supplier link", ComponentLink2URL=N.A.
C3: library part C0201-5.5p-HQ-Murata, "Capacitor, NP0, ±0.05pF, 25V", LCSC=C2187712, Package=0201, ComponentLink1Description=Datasheet, ComponentLink1URL=N.A., ComponentLink2Description="Supplier link", ComponentLink2URL=N.A.
C4: library part C0201-5.5p-HQ-Murata, "Capacitor, NP0, ±0.05pF, 25V", LCSC=C3019008, Package=0201, ComponentLink1Description=Datasheet, ComponentLink1URL=N.A., ComponentLink2Description="Supplier link", ComponentLink2URL=N.A.
C5 C6: library part C0201-15p, "Capacitor, NP0, ±5%, 25V", LCSC=C576456, Package=0402, ComponentLink1Description=Datasheet, ComponentLink1URL=N.A., ComponentLink2Description="Supplier link", ComponentLink2URL=N.A.
C7: library part C0201-5.5p-HQ-Murata, "Capacitor, NP0, ±0.05pF, 25V", LCSC=C565475, Package=0201, ComponentLink1Description=Datasheet, ComponentLink1URL=N.A., ComponentLink2Description="Supplier link", ComponentLink2URL=N.A.
C8: library part C0201-15p, "Capacitor, NP0, ±5%, 25V", LCSC=C524559, Package=0402, ComponentLink1Description=Datasheet, ComponentLink1URL=N.A., ComponentLink2Description="Supplier link", ComponentLink2URL=N.A.
C9: library part C0201-15p, "Capacitor, NP0, ±5%, 25V", Digikey Part Number=490-GJM1555C1H3R7BB01DCT-ND, LCSC=C1855290, Package=0402, ComponentLink1Description=Datasheet, ComponentLink1URL=N.A., ComponentLink2Description="Supplier link", ComponentLink2URL=N.A.
C10 C12 C13: library part CC0402FRNPO9BN390, "CAP CER 39PF 50V C0G/NPO 0402", LCSC Part Number=C327068, Manufacturer=Yageo, Supplier Part Number=7829161, Category="Ceramic Capacitors", ComponentLink1Description=https://datasheet.ciiva.com/26936/getdatasheetpartid-403444-26936051.pdf?src-supplier=Verical, ComponentLink1URL=https://datasheet.ciiva.com/26936/getdatasheetpartid-403444-26936051.pdf?src-supplier=Verical, ComponentLink2Description=https://datasheet.ciiva.com/11587/upy-gp-np0-16v-to-50v-8-11587062.pdf?src-supplier=Avnet, ComponentLink2URL=https://datasheet.ciiva.com/11587/upy-gp-np0-16v-to-50v-8-11587062.pdf?src-supplier=Avnet, Item Type=Capacitor, Manufacturer Part Number=CC0402FRNPO9BN390, Pricing="10000=0.0077, 30000=0.0074, 50000=0.0072, 150000=0.0069, 250000=0.0067 (USD)", RoHS=Yes, Stock=40000, Supplier="Future Electronics"
C11: library part C0201-15p, "Capacitor, NP0, ±5%, 25V", LCSC=C301939, Package=0402, ComponentLink1Description=Datasheet, ComponentLink1URL=N.A., ComponentLink2Description="Supplier link", ComponentLink2URL=N.A.
C14 C20: library part CQ0402GRNPO9BN150, "CAP CER 15PF 50V C0G/NPO 0402", Case Code (Imperial)=0402, Case Code (Metric)=1005, Dielectric=C0G, LCSC Part Number=C577406, Manufacturer=Yageo, Max Operating Temperature=125°C, Min Operating Temperature=-55°C, Package Quantity=10000, Tolerance=2%, Voltage Rating=50V, Case/Package=0402, ComponentLink1Description=http://www.mouser.com/ds/2/447/UPY-High%20Q_NP0_16V-to-250V_11-533944.pdf?src-supplier=Mouser, ComponentLink1URL=http://www.mouser.com/ds/2/447/UPY-High%20Q_NP0_16V-to-250V_11-533944.pdf?src-supplier=Mouser, ComponentLink2Description=http://www.yageo.com/documents/recent/UPY-High%20Q_NP0_16V-to-250V_13.pdf?src-supplier=Digikey, ComponentLink2URL=http://www.yageo.com/documents/recent/UPY-High%20Q_NP0_16V-to-250V_13.pdf?src-supplier=Digikey, Item Type=Capacitors, Manufacturer Part Number=CQ0402GRNPO9BN150, Mounting Technology="Surface Mount", Packaging="Tape and Reel", Pricing="10000=0.04366 (USD)", RoHS=Yes, Series=CQ, Supplier=Digikey, Voltage Rating (DC)=50V, Weight=2.3E-05oz
C15 C17 C21 C23 C25 C29 C30 C32 C40 C41 C42 C49 C50 C59 C60: library part C1005X7R1H104KT000F, "CAP CER 0.1UF 50V X7R 0402", Dielectric=X7R, LCSC Part Number=C361198, Manufacturer=TDK, Tolerance=10%, Voltage=25V, Category="Ceramic Capacitors", ComponentLink1Description=LCSC, ComponentLink1URL=https://www.lcsc.com/product-detail/Multilayer-Ceramic-Capacitors-MLCC-SMD-SMT_TDK-C1005X7R1H104KT000F_C361198.html, Item Type=Capacitor, Manufacturer Part Number=C1005X7R1H104KT000F, RoHS=No, Supplier 1=Avnet, Supplier Part Number 1=C1005X7R1H104KT000F
C16 C22: library part C0805-47µ-10V, "Capacitor, X5R, ±20%, 10V", LCSC=C124129, Package=0805, ComponentLink1Description=Datasheet, ComponentLink1URL=https://search.murata.co.jp/Ceramy/image/img/A01X/G101/ENG/GRM21BR61A476ME15-01A.pdf, ComponentLink2Description="Supplier link", ComponentLink2URL=N.A.
C18 C19 C38 C54 C55: library part CL05A475MO5NUNC, "CAP CER 4.7UF 16V X5R 0402", Case Code (Imperial)=0402, Case Code (Metric)=1005, Manufacturer=Samsung, Max Operating Temperature=85°C, Min Operating Temperature=-55°C, Tolerance=20%, Voltage Rating=16V, Capacitance=4.7uF, Case/Package=0402, Category="Ceramic Capacitors", ComponentLink1Description=http://www.farnell.com/datasheets/2710653.pdf?src-supplier=Farnell, ComponentLink1URL=http://www.farnell.com/datasheets/2710653.pdf?src-supplier=Farnell, ComponentLink2Description=http://www.samsungsem.com/kr/support/product-search/mlcc/CL05A475MO5NUNC.jsp?src-supplier=Digikey, ComponentLink2URL=http://www.samsungsem.com/kr/support/product-search/mlcc/CL05A475MO5NUNC.jsp?src-supplier=Digikey, ComponentLink3Description=http://www.farnell.com/datasheets/2710653.pdf?src-supplier=Element14, ComponentLink3URL=http://www.farnell.com/datasheets/2710653.pdf?src-supplier=Element14, ComponentLink4Description=https://datasheet.octopart.com/CL05A475MO5NUNC-Samsung-Electro-Mechanics-datasheet-123102911.pdf?src-supplier=Future+Electronics, ComponentLink4URL=https://datasheet.octopart.com/CL05A475MO5NUNC-Samsung-Electro-Mechanics-datasheet-123102911.pdf?src-supplier=Future+Electronics, ComponentLink5Description=http://www.farnell.com/datasheets/2710653.pdf?src-supplier=Newark, ComponentLink5URL=http://www.farnell.com/datasheets/2710653.pdf?src-supplier=Newark, Height=550um, Length=0.039inch, Manufacturer Part Number=CL05A475MO5NUNC, Material=4241ConductorMaterial, Mount="Surface Mount", Packaging="Cut Tape", Pricing 1="10000=0.09712 (USD)", RoHS=Yes, RoHS Compliant=Yes, Series=CL, Stock 1=50000, Supplier 1=Avnet, Supplier Part Number 1=CL05A475MO5NUNC, Thickness=0.022inch, Voltage Rating (DC)=16V, Width=0.02inch
C24: library part C0201-3.1p-HQ-Murata, "Capacitor, NP0, ±0.05pF, 25V", Manufacturer=Murata, Manufacturer Part Number=GJM0335C1E3R1WB01, Part number IPS="00000001776, 80000001941", Supplier Part Number 1=N.A., Artikkelnr Noca=N.A., Component Class=Capacitors, ComponentLink1Description=Datasheet, ComponentLink1URL=N.A., ComponentLink2Description="Supplier link", ComponentLink2URL=N.A., Footprint Doc=0201, HelpURL=https://psearch.en.murata.com/capacitor/product/GJM0335C1E3R1WB01%23.html, LatestRevisionDate=2019-01-14, Note=25V, Pad Count=2, Part Number=C0201-3.1p-HQ-Murata, PartId=100200423, Published=2019-01-14, Supplier 1=N.A., Supplier 2=N.A., Supplier Part Number 2=N.A.
C26 C27 C28 C56: library part GJM1555C1H120GB01D, "CAP CER 12PF 50V C0G/NP0 0402", Case Code (Imperial)=0402, Case Code (Metric)=1005, Dielectric=C0G, LCSC Part Number=C161305, Manufacturer=Murata, Max Operating Temperature=125°C, Min Operating Temperature=-55°C, Package Quantity=10000, Supplier Part Number 1=490-8078-1-ND, Tolerance=2%, Voltage Rating=50V, Capacitance=12pF, Case/Package=0402, Category="Ceramic Capacitors", ComponentLink1Description=https://datasheet.ciiva.com/11608/product-11608208.pdf?src-supplier=Avnet, ComponentLink1URL=https://datasheet.ciiva.com/11608/product-11608208.pdf?src-supplier=Avnet, ComponentLink2Description=https://datasheet.ciiva.com/29542/partnumbering-e-01-29542716.pdf?src-supplier=Digi-Key, ComponentLink2URL=https://datasheet.ciiva.com/29542/partnumbering-e-01-29542716.pdf?src-supplier=Digi-Key, ComponentLink3Description=https://datasheet.ciiva.com/29542/partnumbering-e-01-29542715.pdf?src-supplier=Digi-Key, ComponentLink3URL=https://datasheet.ciiva.com/29542/partnumbering-e-01-29542715.pdf?src-supplier=Digi-Key, ComponentLink4Description=https://datasheet.ciiva.com/29542/partnumbering-e-01-29542717.pdf?src-supplier=Digi-Key, ComponentLink4URL=https://datasheet.ciiva.com/29542/partnumbering-e-01-29542717.pdf?src-supplier=Digi-Key, Construction=Flat, Depth=0.5mm, Height=0.5mm, Lead Free="Lead Free", Length=1mm, Manufacturer Part Number=GJM1555C1H120GB01D, Mount="Surface Mount", Packaging="Tape and Reel", Pricing 1="1=0.18000, 10=0.12600, 50=0.07560, 100=0.06390, 500=0.04370, 1000=0.03865, 2500=0.03698, 5000=0.03361 (USD)", Radiation Hardening=No, RoHS=Yes, RoHS Compliant=Yes, Series=GJM, Stock 1=266975, Supplier 1=Digi-Key, Termination=SMD/SMT, Thickness=0.022inch, Voltage Rating (DC)=50V, Width=0.5mm
C31 C53: library part GRM155R70J105KA12J, "CAP CER 1UF 6.3V X7R 0402", Case Code (Imperial)=0402, Case Code (Metric)=1005, Dielectric=X7R, LCSC Part Number=C2167130, Manufacturer=Murata, Max Operating Temperature=125°C, Min Operating Temperature=-55°C, Package Quantity=50000, Tolerance=10%, Voltage Rating=6.3V, Case/Package=0402, ComponentLink1Description=http://www.mouser.com/ds/2/281/c02e-2905.pdf?src-supplier=Mouser, ComponentLink1URL=http://www.mouser.com/ds/2/281/c02e-2905.pdf?src-supplier=Mouser, ComponentLink2Description=https://datasheet.octopart.com/GRM155R70J105KA12J-Murata-datasheet-32479577.pdf?src-supplier=Future+Electronics, ComponentLink2URL=https://datasheet.octopart.com/GRM155R70J105KA12J-Murata-datasheet-32479577.pdf?src-supplier=Future+Electronics, ComponentLink3Description=https://datasheet.octopart.com/GRM155R70J105KA12J-Murata-datasheet-155345054.pdf?src-supplier=Element14, ComponentLink3URL=https://datasheet.octopart.com/GRM155R70J105KA12J-Murata-datasheet-155345054.pdf?src-supplier=Element14, ComponentLink4Description=http://search.murata.co.jp/Ceramy/image/img/A01X/G101/ENG/GRM155R70J105KA12-01.pdf?src-supplier=Digikey, ComponentLink4URL=http://search.murata.co.jp/Ceramy/image/img/A01X/G101/ENG/GRM155R70J105KA12-01.pdf?src-supplier=Digikey, ComponentLink5Description=https://datasheet.octopart.com/GRM155R70J105KA12J-Murata-datasheet-165579666.pdf?src-supplier=TME, ComponentLink5URL=https://datasheet.octopart.com/GRM155R70J105KA12J-Murata-datasheet-165579666.pdf?src-supplier=TME, Height=550um, Item Type=Capacitors, Length=0.039inch, Manufacturer Part Number=GRM155R70J105KA12J, Material=4241ConductorMaterial, Mounting Technology="Surface Mount", Packaging="Tape and Reel", Pins=2NUMBER, Pricing="1=0.1, 10=0.01, 50=0.01, 100=0.008, 1000=0.008, 10000=0.007 (USD)", RoHS=Yes, RoHS Compliant=Yes, Series=GRM, Stock=273640, Supplier=Mouser, Termination=SMD/SMT, Thickness=0.022inch, Voltage Rating (DC)=6.3V, Weight=0.000212oz, Width=0.02inch
C33: library part CC0402BRNPO9BN1R0, "CAP CER 1PF 50V C0G/NPO 0402", LCSC Part Number=C309455, Manufacturer=Yageo, Supplier Part Number=7847221, Temperature Coefficient=30ppm/°C, Category="Ceramic Capacitors", ComponentLink1Description=https://datasheet.ciiva.com/26862/getdatasheetpartid-403422-26862565.pdf?src-supplier=Verical, ComponentLink1URL=https://datasheet.ciiva.com/26862/getdatasheetpartid-403422-26862565.pdf?src-supplier=Verical, ComponentLink2Description=https://datasheet.ciiva.com/11587/upy-gp-np0-16v-to-50v-8-11587115.pdf?src-supplier=Avnet, ComponentLink2URL=https://datasheet.ciiva.com/11587/upy-gp-np0-16v-to-50v-8-11587115.pdf?src-supplier=Avnet, Halogen Free=5694HalogenFree, Item Type=Capacitor, Manufacturer Part Number=CC0402BRNPO9BN1R0, Pricing="10000=0.0034, 40000=0.0032, 150000=0.0031, 250000=0.003, 500000=0.0028 (USD)", RoHS=Yes, Stock=180000, Supplier="Future Electronics"
C34: library part CC0402BRNPO9BN1R2, "CAP CER 1.2PF 50V C0G/NPO 0402", LCSC Part Number=C327292, Manufacturer=Yageo, Temperature Coefficient=30ppm/°C, ComponentLink1Description=https://datasheet.ciiva.com/13386/upy-gp-np0-16v-to-50v-8-13386283.pdf?src-supplier=Mouser, ComponentLink1URL=https://datasheet.ciiva.com/13386/upy-gp-np0-16v-to-50v-8-13386283.pdf?src-supplier=Mouser, ComponentLink2Description=https://datasheet.ciiva.com/15189/getdatasheetpartid-468320-15189100.pdf?src-supplier=Verical, ComponentLink2URL=https://datasheet.ciiva.com/15189/getdatasheetpartid-468320-15189100.pdf?src-supplier=Verical, ComponentLink3Description=https://datasheet.ciiva.com/11587/upy-gp-np0-16v-to-50v-8-11587117.pdf?src-supplier=Avnet, ComponentLink3URL=https://datasheet.ciiva.com/11587/upy-gp-np0-16v-to-50v-8-11587117.pdf?src-supplier=Avnet, Halogen Free=5694HalogenFree, Item Type=Capacitor, Manufacturer Part Number=CC0402BRNPO9BN1R2, Pricing="1=0.1, 10=0.032, 50=0.0184, 100=0.0142, 500=0.01068, 1000=0.00839, 2500=0.00762, 5000=0.00702 (USD)", RoHS=Yes, Stock=92678, Supplier=Digikey
C35: library part C0201-0.7p-HQ-Murata, "Ceramic Capacitor C0G, NP0 0201, ±0.1pF 25V", LCSC=NILL, Package=0402, ComponentLink1Description=Datasheet, ComponentLink1URL=https://search.murata.co.jp/Ceramy/image/img/A01X/G101/ENG/GJM0335C1ER70BB01-01.pdf, ComponentLink2Description="Supplier link", ComponentLink2URL=https://www.murata.com/en-eu/products/productdetail?partno=GJM0335C1ER70BB01%23
C36: library part C0201-0.7p-HQ-Murata, "Ceramic Capacitor C0G, NP0 0201, ±0.1pF 25V", LCSC=NILL, Package=0201, ComponentLink1Description=Datasheet, ComponentLink1URL=https://search.murata.co.jp/Ceramy/image/img/A01X/G101/ENG/GJM0335C1ER70BB01-01.pdf, ComponentLink2Description="Supplier link", ComponentLink2URL=https://www.murata.com/en-eu/products/productdetail?partno=GJM0335C1ER70BB01%23
C37: library part GCM1555C1H821JA16D, "CAP CER 820PF 50V C0G/NP0 0402", LCSC Part Number=C161159, Manufacturer=Murata, ComponentLink1Description=https://datasheet.octopart.com/GCM1555C1H821JA16D-Murata-datasheet-137472381.pdf?src-supplier=Future+Electronics, ComponentLink1URL=https://datasheet.octopart.com/GCM1555C1H821JA16D-Murata-datasheet-137472381.pdf?src-supplier=Future+Electronics, ComponentLink2Description=https://datasheet.octopart.com/GCM1555C1H821JA16D-Murata-datasheet-12511495.pdf?src-supplier=TME, ComponentLink2URL=https://datasheet.octopart.com/GCM1555C1H821JA16D-Murata-datasheet-12511495.pdf?src-supplier=TME, Item Type=Capacitors, Manufacturer Part Number=GCM1555C1H821JA16D, Pricing="1=0.1, 10=0.029, 50=0.029, 100=0.017, 1000=0.013, 10000=0.007 (USD)", RoHS=Yes, Stock=40971, Supplier=Mouser
C39 C43 C44 C45 C46 C47 C48 C51 C52: library part GRM158R61A226ME15D, "CAP CER 22UF 10V X5R 0402", Case/Package=343Case, Dielectric=1537DielectricType, LCSC Part Number=C3845593, Manufacturer=Murata, Max Operating Temperature=85°C, Min Operating Temperature=-55°C, Supplier Part Number=81-GRM158R61A226ME5D, Tolerance=20%, Voltage Rating=10V, Category="Ceramic Capacitors", Height=800um, Item Type=Capacitor, Length=1mm, Manufacturer Part Number=GRM158R61A226ME15D, Material=4241ConductorMaterial, Pricing="1=0.46, 10=0.225, 50=0.225, 100=0.146, 1000=0.124, 10000=0.106 (USD)", RoHS=Yes, Stock=328944, Supplier=Mouser, Thickness=800um, Voltage Rating (DC)=10V, Width=500um
C57: library part CC0402KRX5R7BB105, "CAP CER 1UF 16V X5R 0402", Case Code (Imperial)=0402, Case Code (Metric)=1005, Dielectric=X5R, LCSC Part Number=C325464, Manufacturer=Yageo, Max Operating Temperature=85°C, Min Operating Temperature=-55°C, Supplier Part Number 1=311-1691-6-ND, Tolerance=10%, Voltage Rating=16V, Capacitance=1uF, Case/Package=0402, ComponentLink1Description=http://www.yageo.com/documents/recent/UPY-GPHC_X5R_4V-to-50V_12.pdf?src-supplier=Avnet+Europe, ComponentLink1URL=http://www.yageo.com/documents/recent/UPY-GPHC_X5R_4V-to-50V_12.pdf?src-supplier=Avnet+Europe, Composition=Ceramic, Depth=0.5mm, Halogen Free="Halogen Free", Height=0.5mm, Item Type=Capacitor, Lead Free="Lead Free", Length=1mm, Manufacturer Part Number=CC0402KRX5R7BB105, Mount="Surface Mount", Packaging="Tape and Reel", Pricing 1="1=0.36, 10=0.252, 100=0.1512, 500=0.1134, 1000=0.09576, 2500=0.09072, 5000=0.08568 (USD)", Radiation Hardening=No, Stock 1=1405667, Supplier 1=Digi-Key, Termination=SMD/SMT, Thickness=0.022inch, Voltage Rating (DC)=16V, Weight=2.3E-05oz, Width=0.02inch
C58: library part CC0402KRX7R9BB473, "CAP CER 0.047UF 50V X7R 0402", Case Code (Imperial)=0402, Case Code (Metric)=1005, Dielectric=1511DielectricType, LCSC Part Number=C272875, Manufacturer=Yageo, Max Operating Temperature=125°C, Min Operating Temperature=-55°C, Supplier Part Number=2095687, Temperature Coefficient=30ppm/°C, Tolerance=10%, Voltage Rating=50V, Case/Package=0402, Category="Ceramic Capacitors", ComponentLink1Description=https://datasheet.octopart.com/CC0402KRX7R9BB473-Yageo-datasheet-166511530.pdf?src-supplier=Future+Electronics, ComponentLink1URL=https://datasheet.octopart.com/CC0402KRX7R9BB473-Yageo-datasheet-166511530.pdf?src-supplier=Future+Electronics, ComponentLink2Description=http://www.yageo.com/documents/recent/UPY-GPHC_X7R_6.3V-to-50V_18.pdf?src-supplier=Digikey, ComponentLink2URL=http://www.yageo.com/documents/recent/UPY-GPHC_X7R_6.3V-to-50V_18.pdf?src-supplier=Digikey, ComponentLink3Description=https://datasheet.octopart.com/CC0402KRX7R9BB473-Yageo-datasheet-140260305.pdf?src-supplier=Newark, ComponentLink3URL=https://datasheet.octopart.com/CC0402KRX7R9BB473-Yageo-datasheet-140260305.pdf?src-supplier=Newark, Halogen Free=5694HalogenFree, Height=550um, Item Type=Capacitor, Lead Free=5697LeadFree, Length=0.039inch, Manufacturer Part Number=CC0402KRX7R9BB473, Material=4241ConductorMaterial, Mounting Technology="Surface Mount", Packaging="Tape and Reel", Pricing="10000=0.0044, 40000=0.0042, 100000=0.004, 150000=0.0041, 250000=0.0039, 400000=0.0037, 500000=0.0038 (USD)", RoHS=Yes, RoHS Compliant=Yes, Series=CC, Stock=1130000, Supplier="Future Electronics", Thickness=0.022inch, Voltage Rating (DC)=50V, Width=0.02inch